# Altium PCB FMU3_REV_E.PcbDoc (part 1 of 4)
Units mm, origin at the board's own origin, x right, y up, seen from the top; angles counter-clockwise.
Board outline 34.01 x 34.03 mm, 8 copper layers (Top, GND_top, HorizontalTop, Verticall_top, Horizontal_bot, VerticalBot, GND_BOT, Bottom), stack 1.63 mm thick; 171 components, 250 nets, 878 pads, 427 vias.
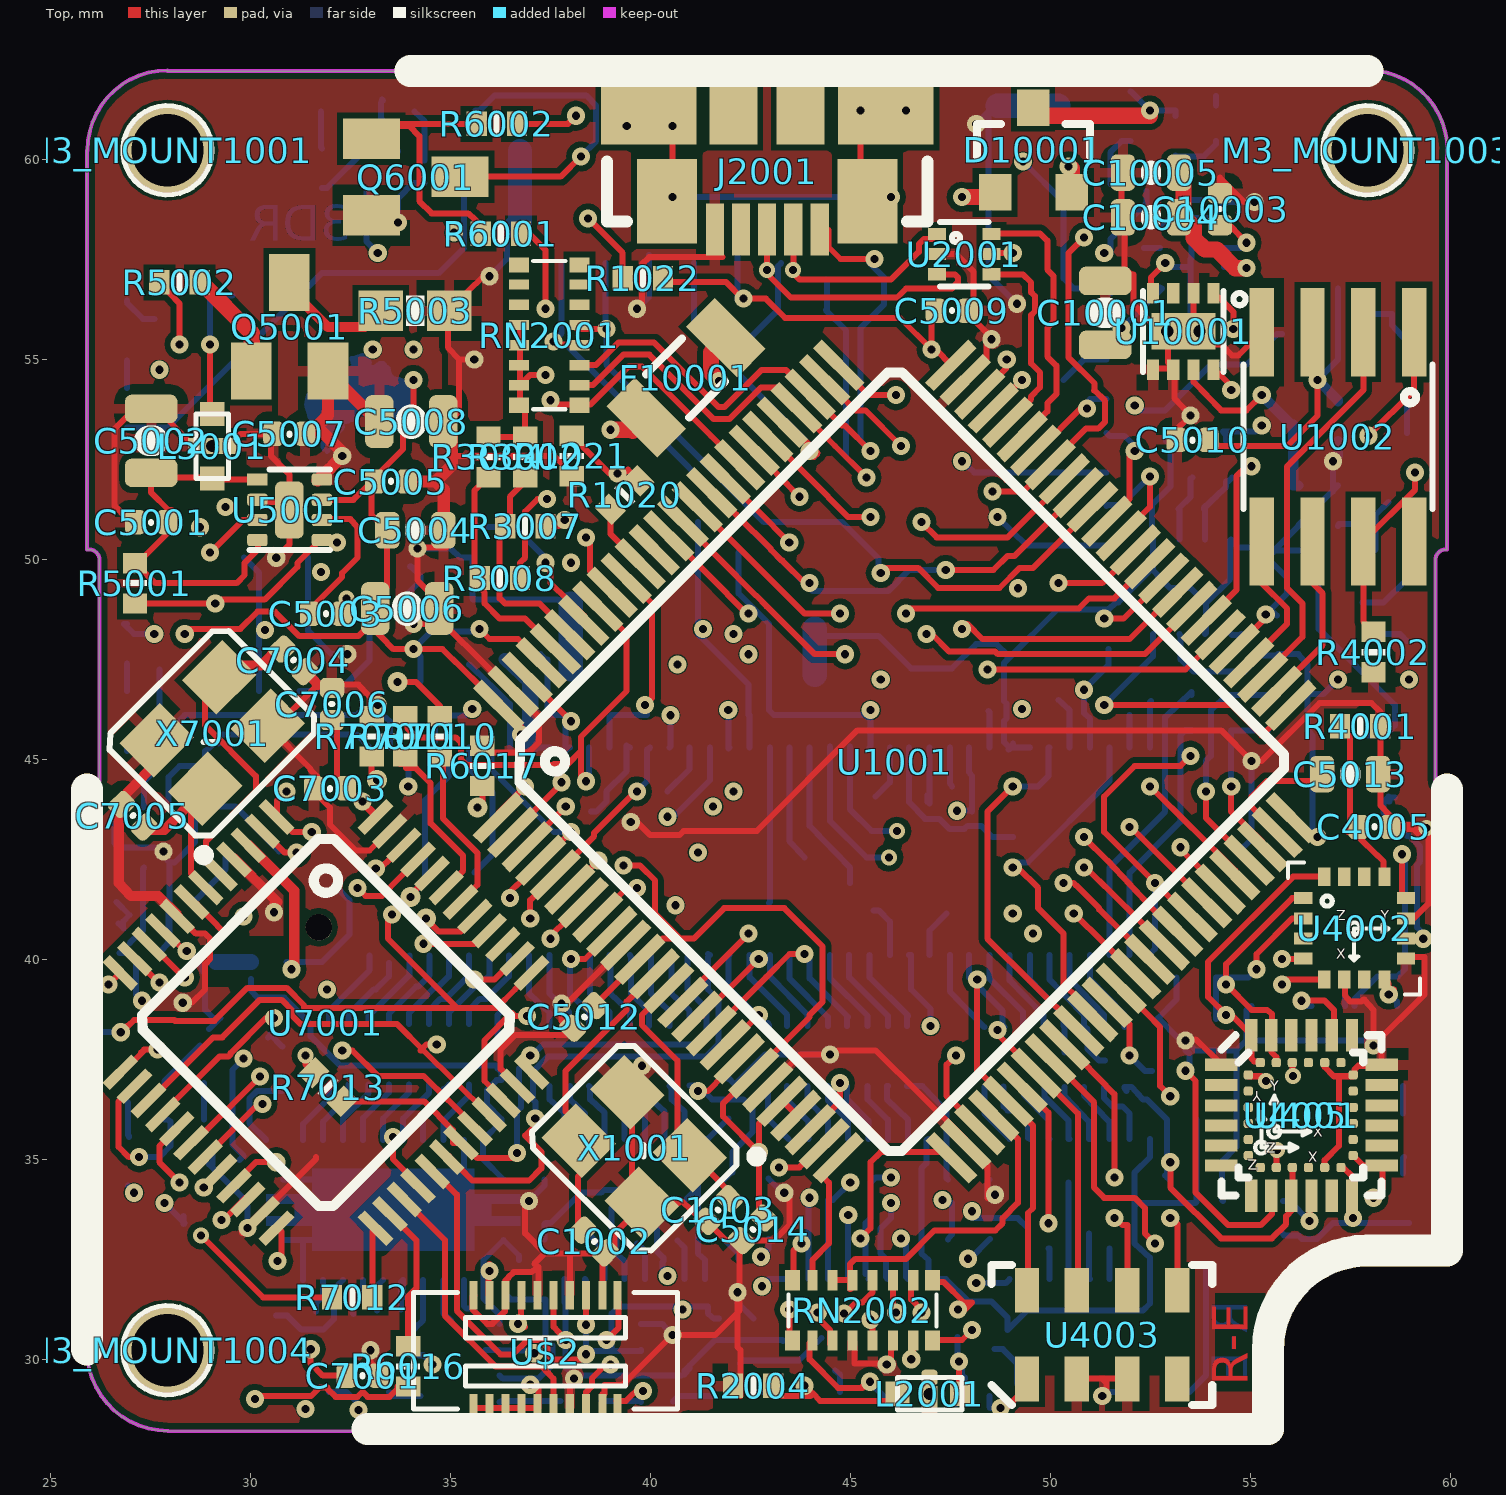
[diagram p0: Top view]
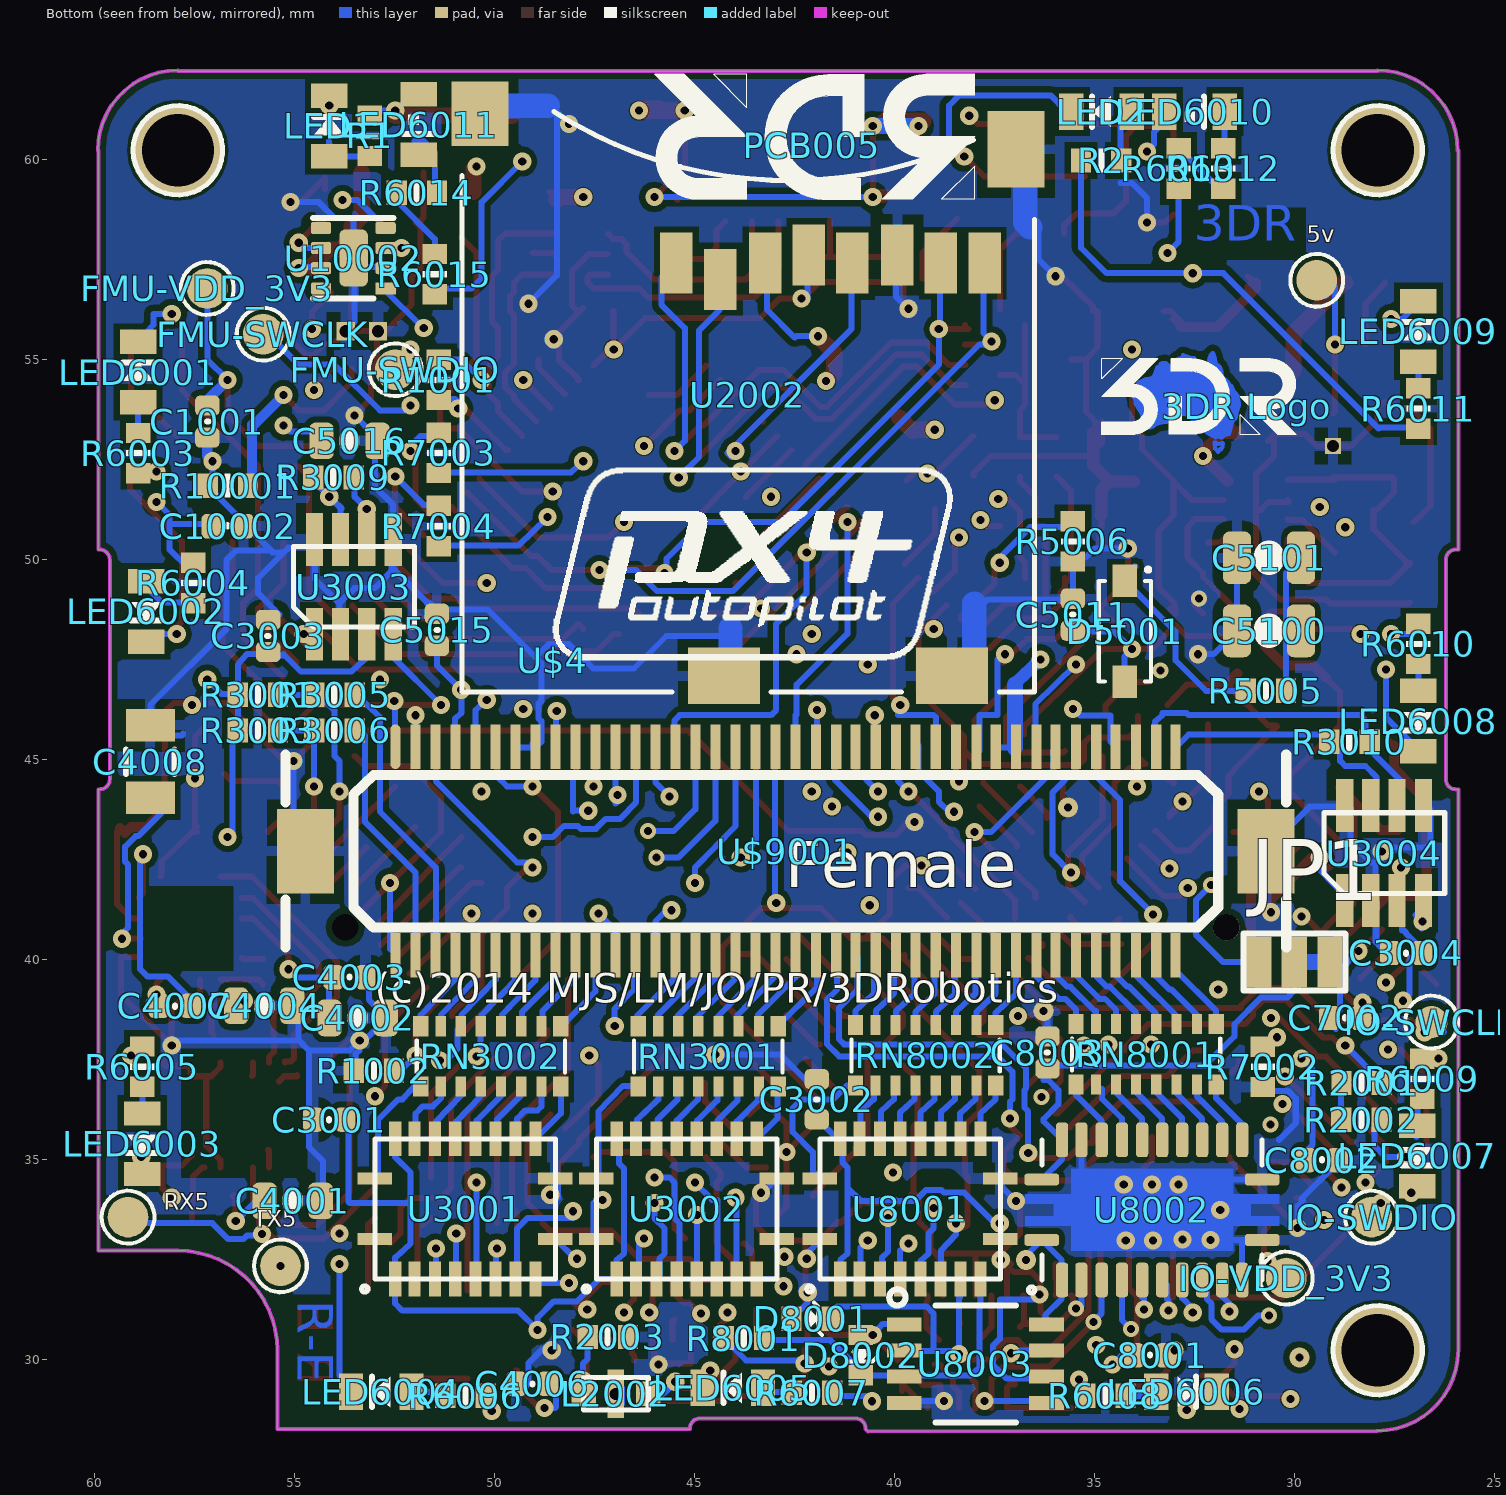
[diagram p1: Bottom view, seen from below]
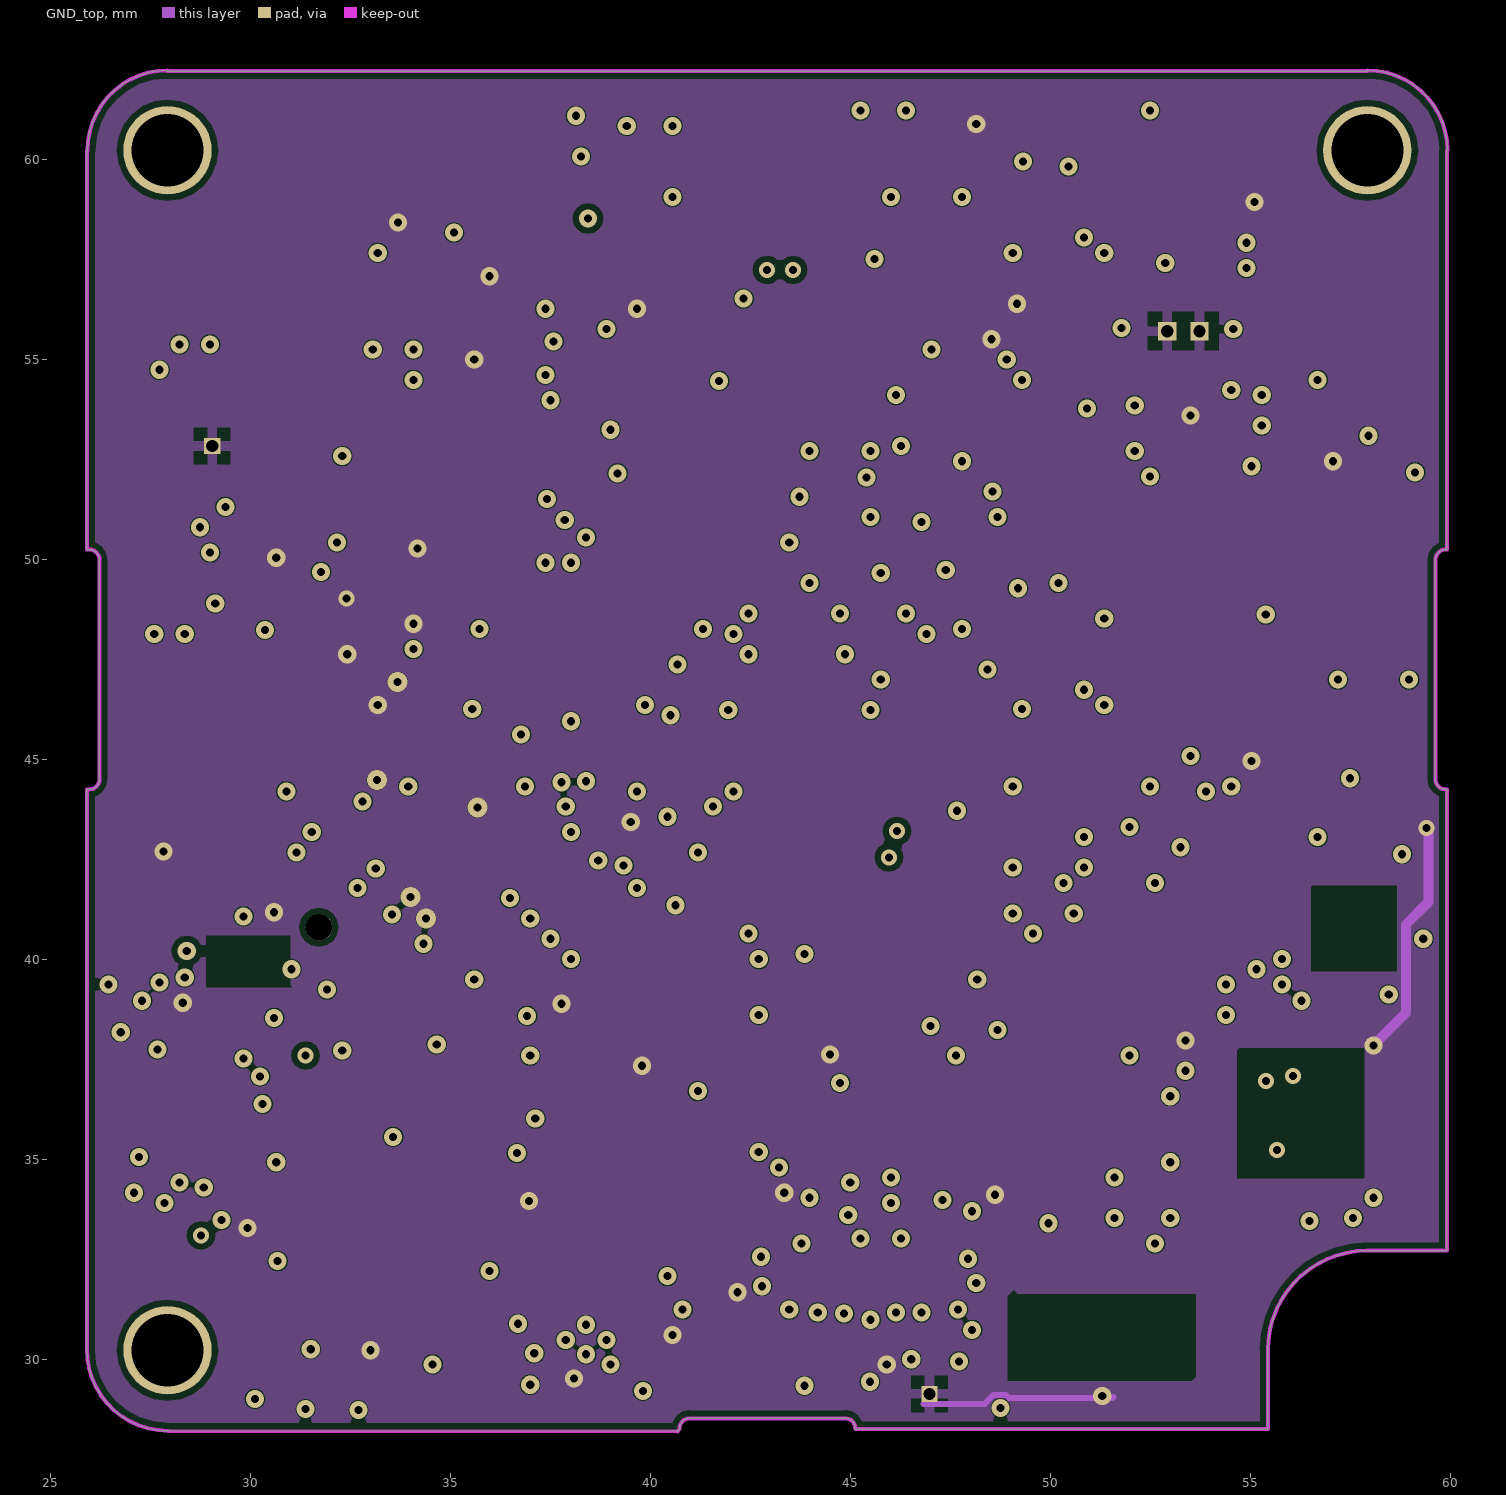
[diagram p2: GND_top]
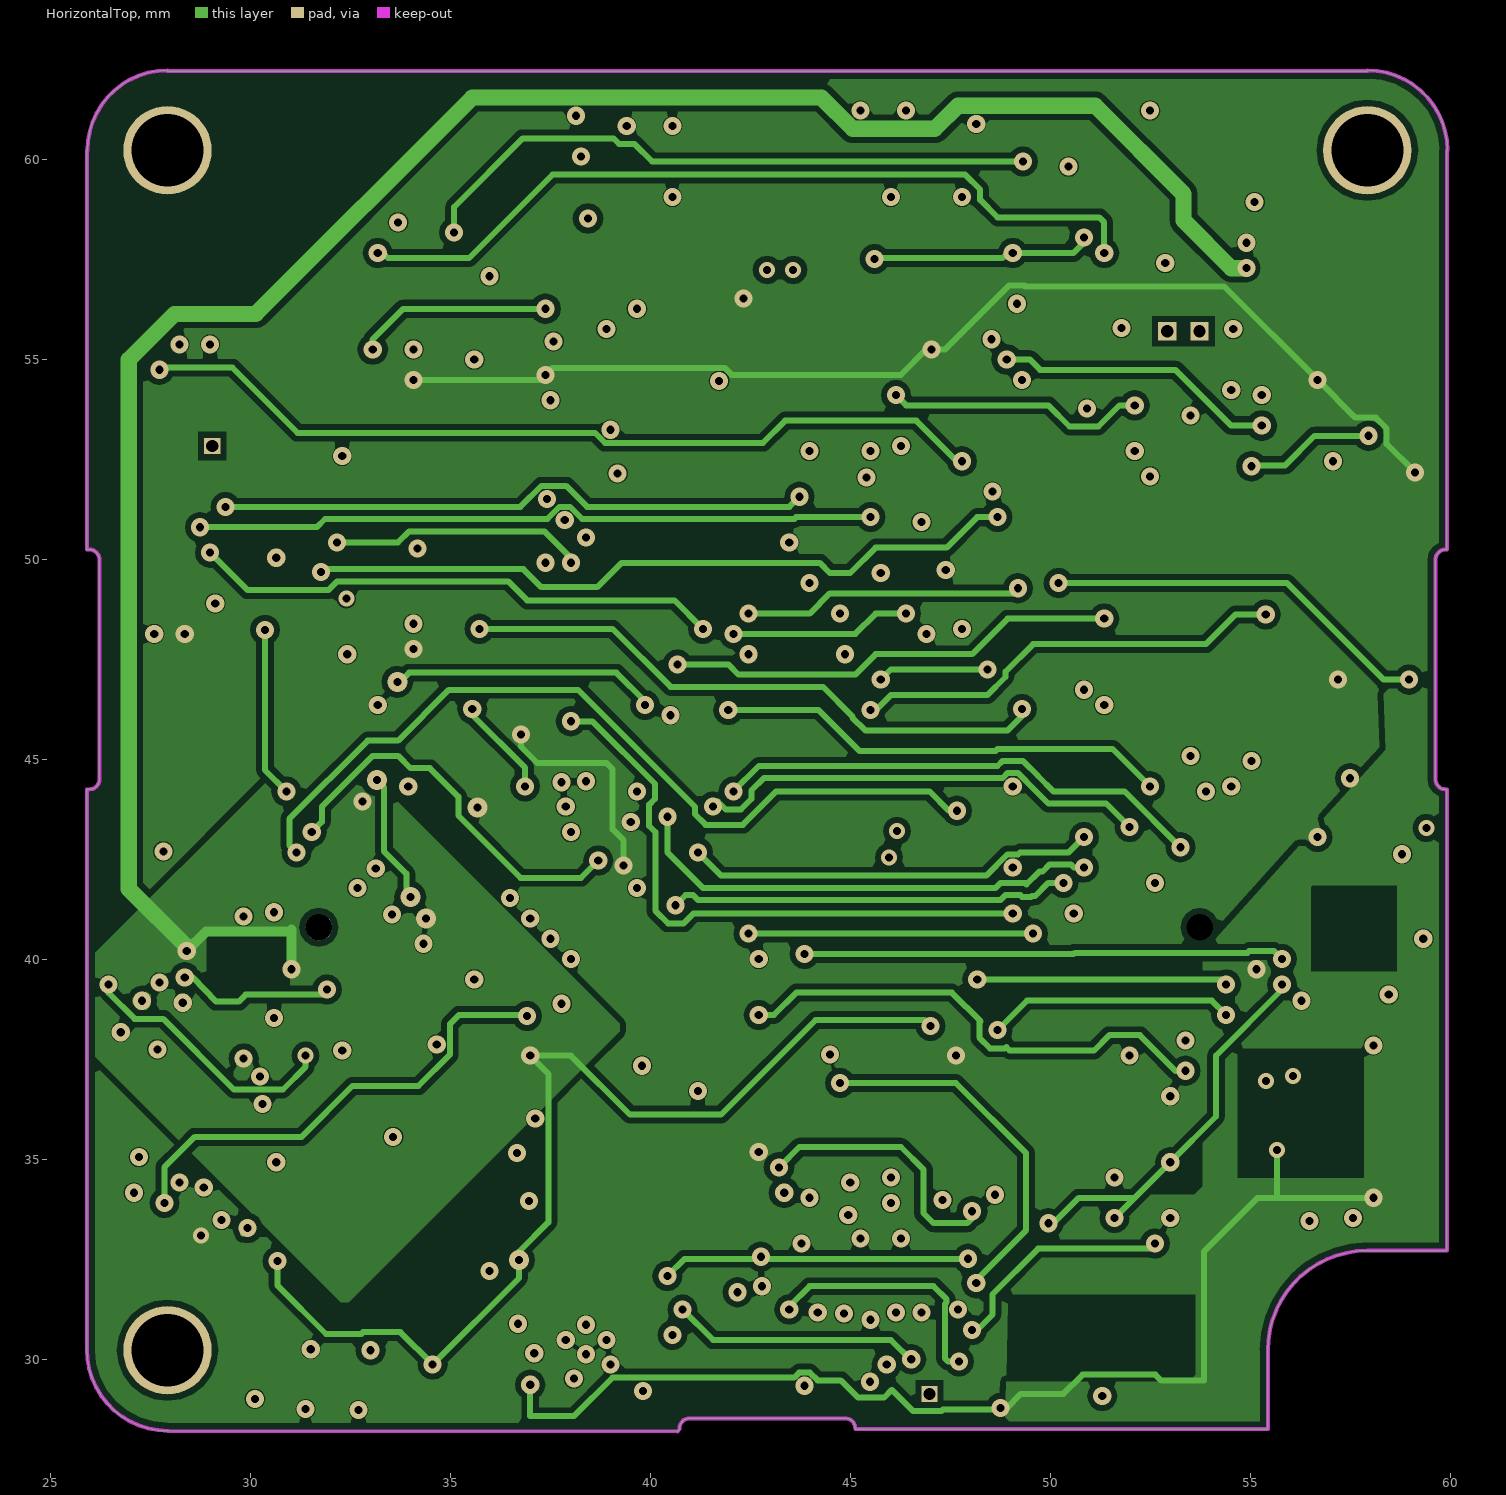
[diagram p3: HorizontalTop]
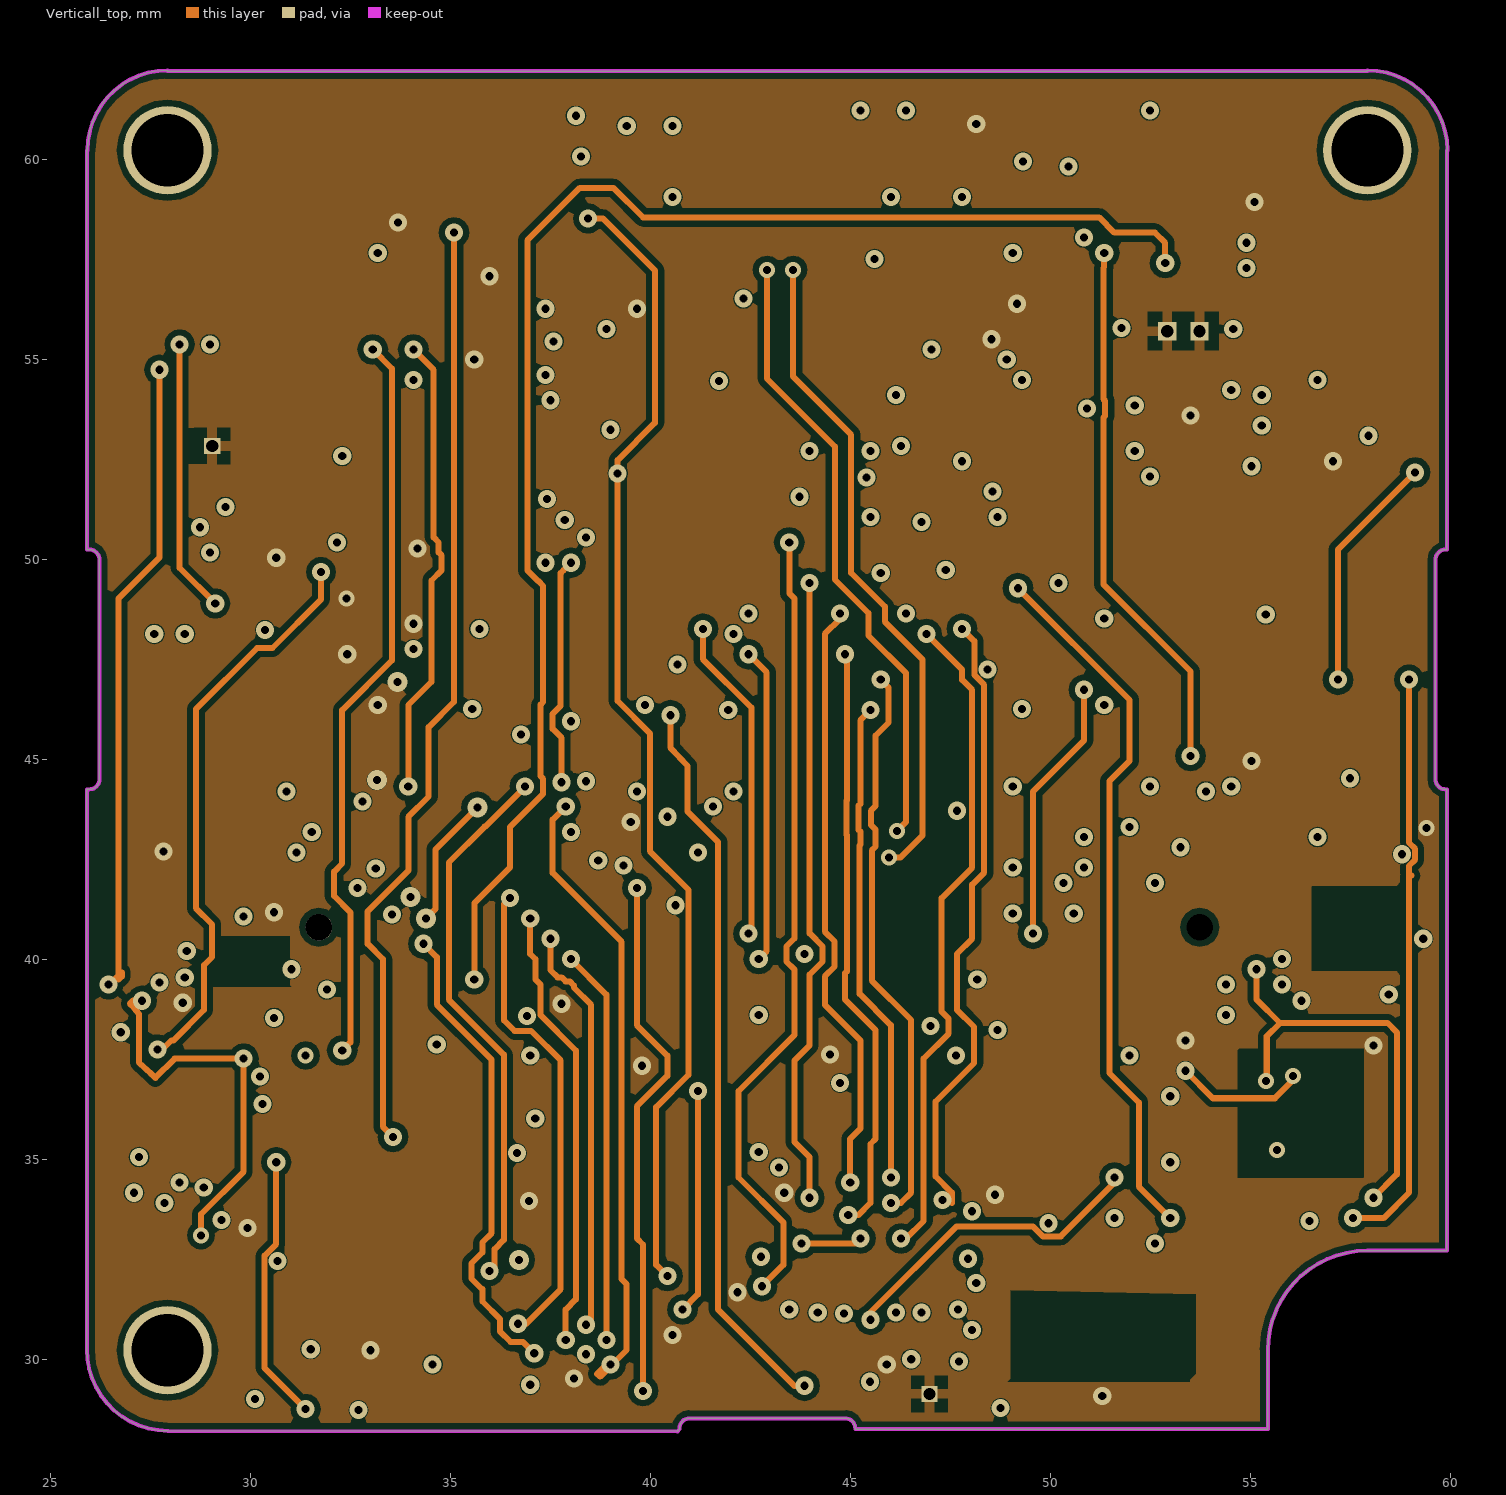
[diagram p4: Verticall_top]
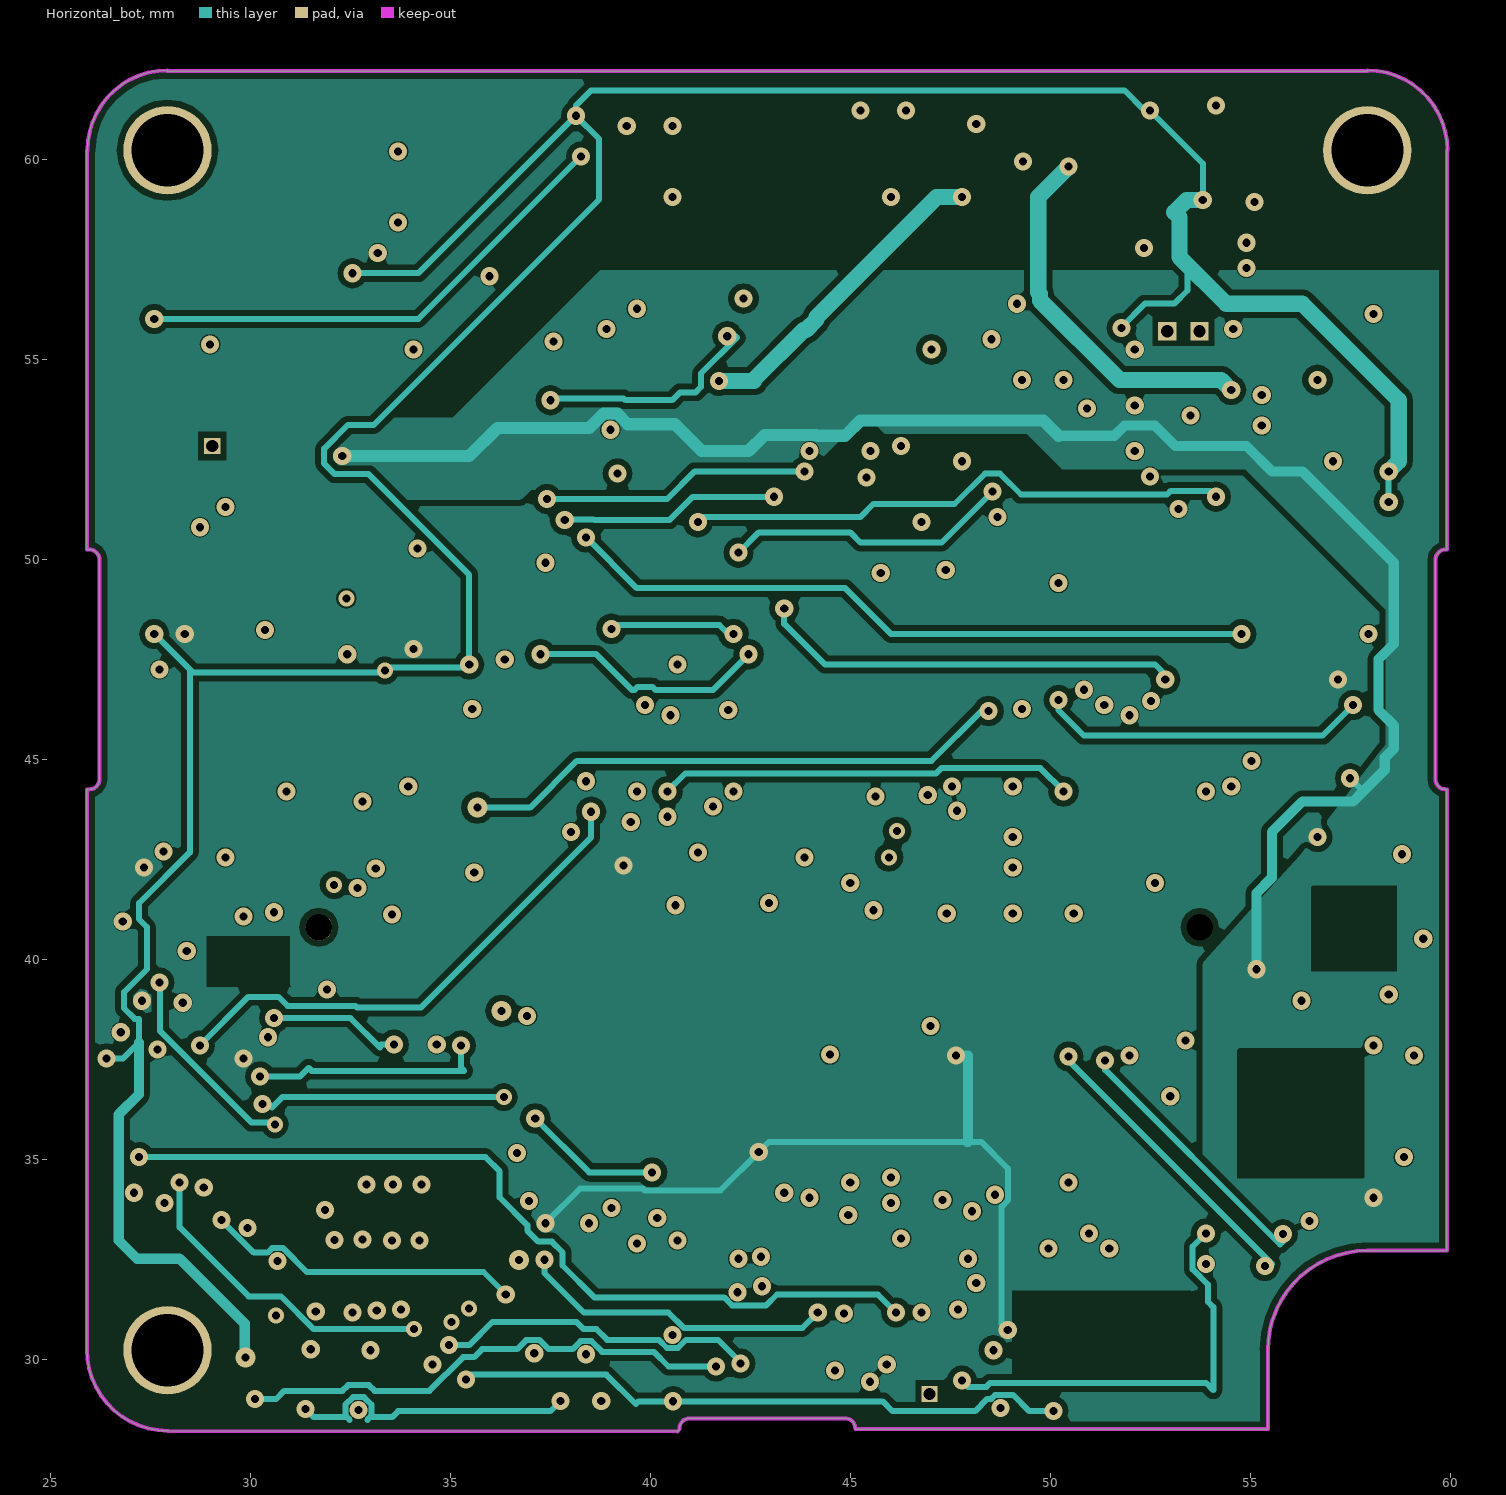
[diagram p5: Horizontal_bot]
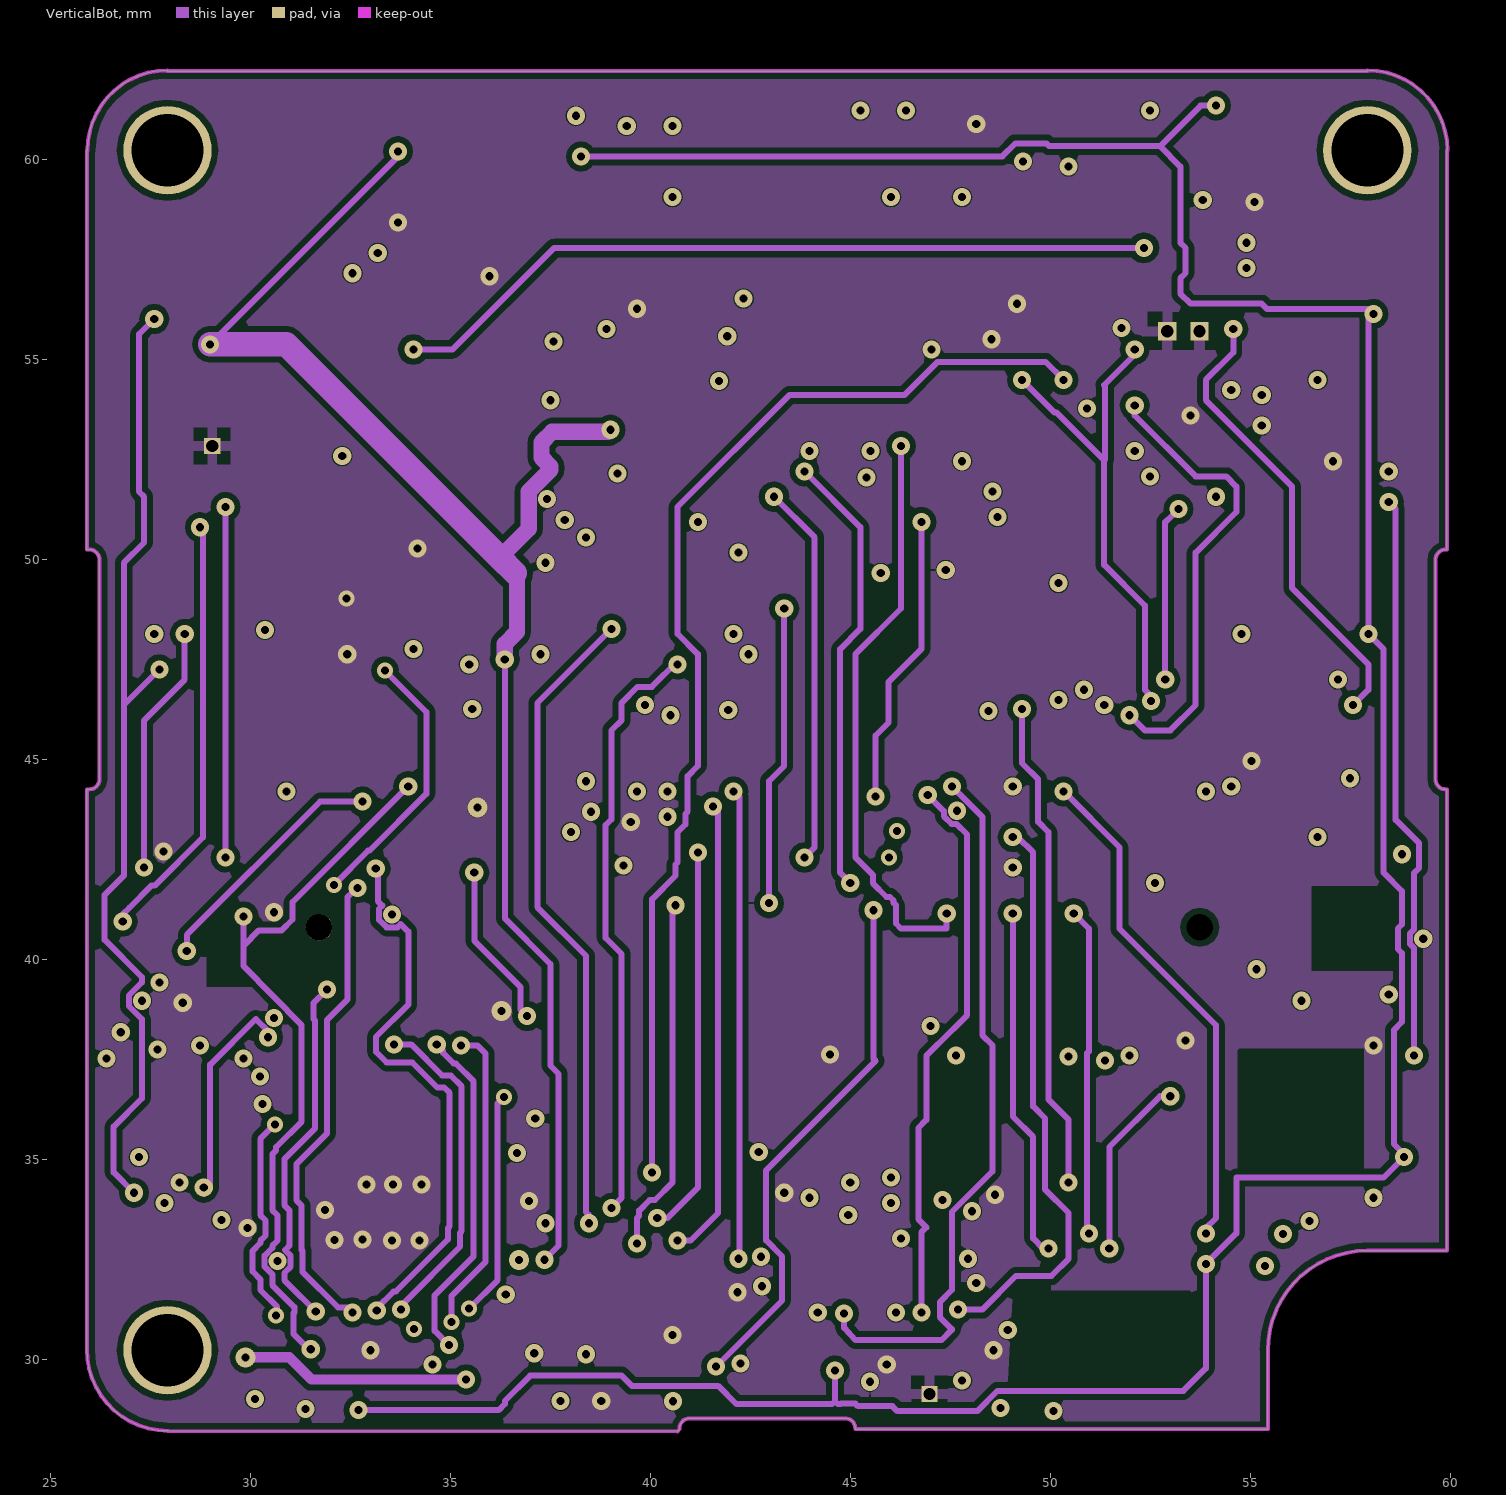
[diagram p6: VerticalBot]
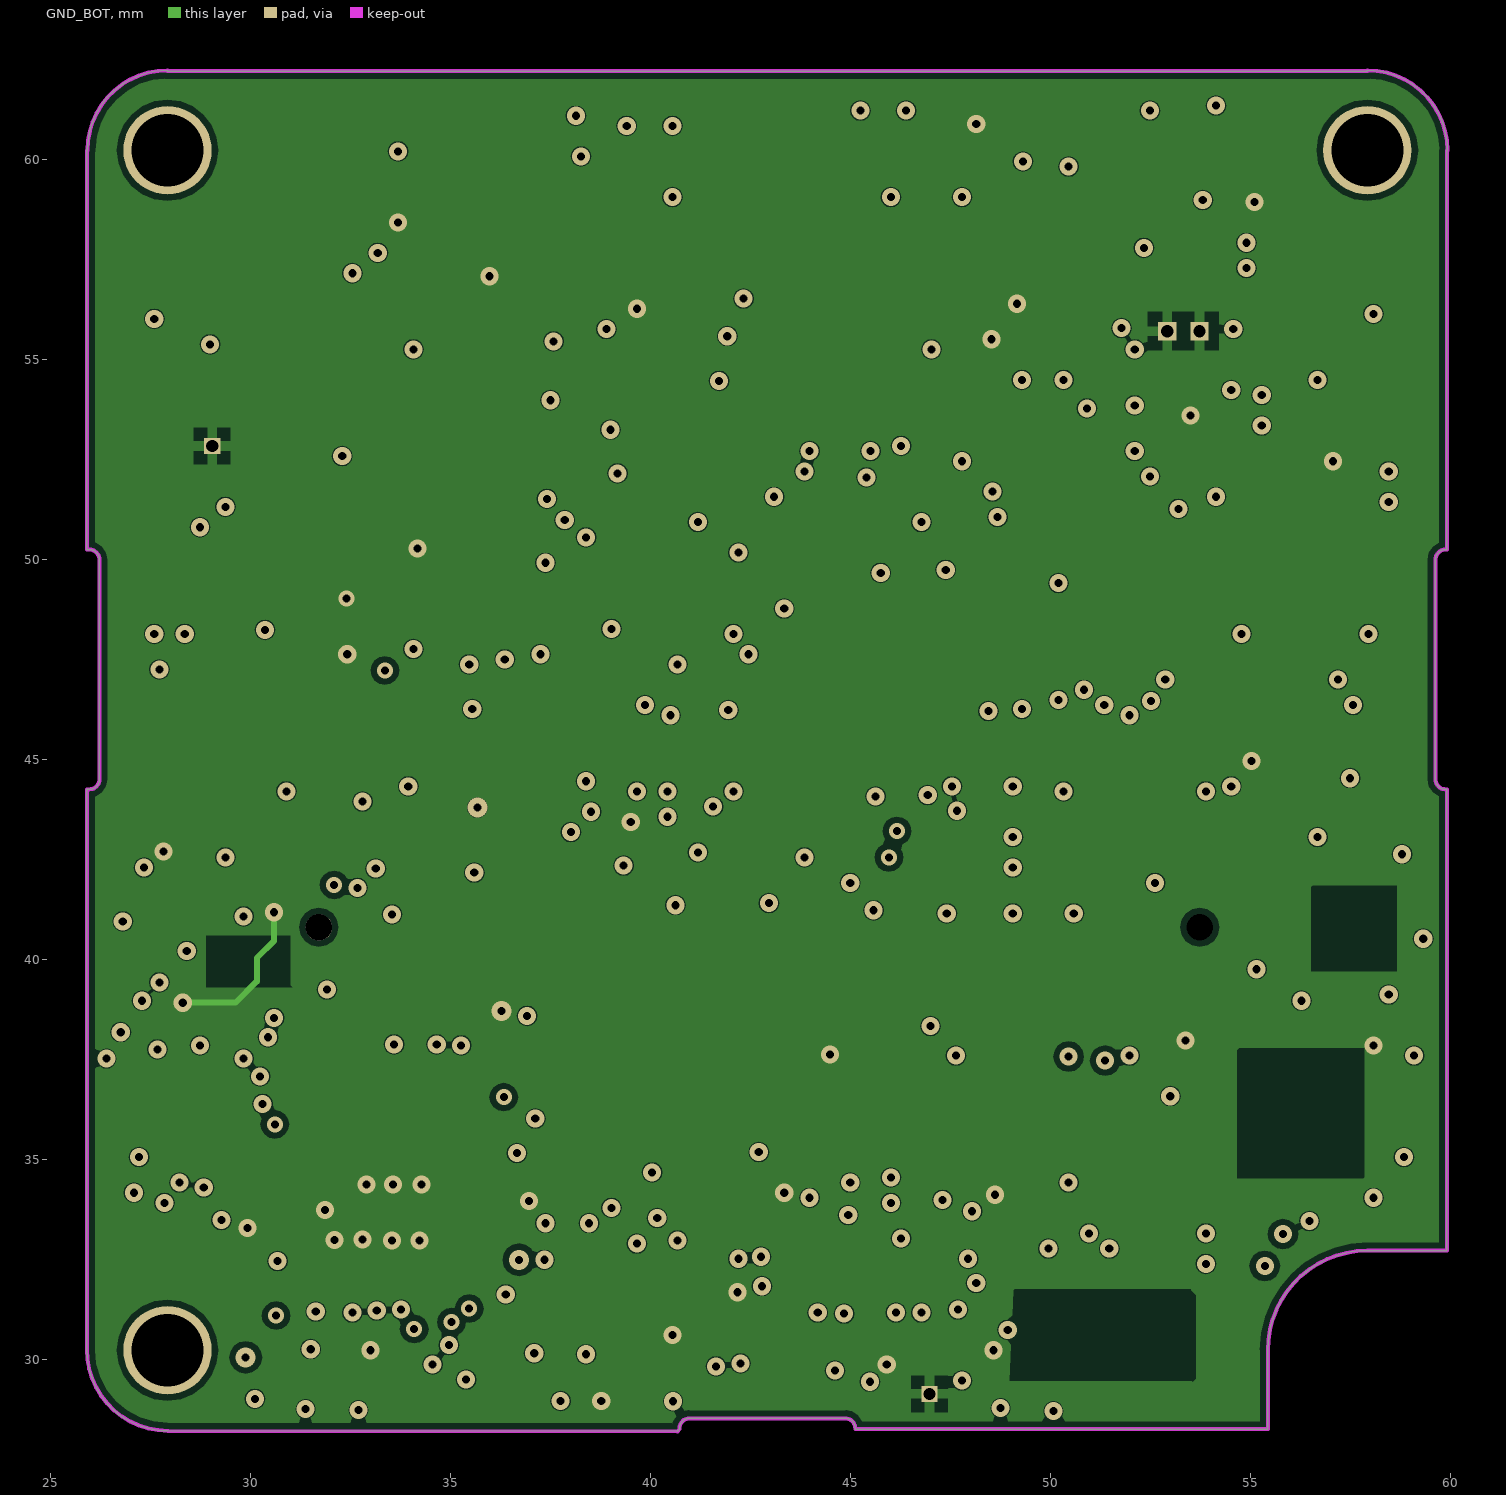
[diagram p7: GND_BOT]

## Layer stack, top to bottom
Top Solder: solder mask 0.0102, Solder Resist (Black Matte), Dk 3.5
Top: signal copper 0.035
Dielectric 1: core 0.15, FR-4, Dk 4.8
GND_top: signal copper 0.035
Dielectric 2: prepreg 0.25, FR-4, Dk 4.8
HorizontalTop: signal copper 0.035
Dielectric 3: core 0.15, FR-4, Dk 4.8
Verticall_top: signal copper 0.035
Dielectric 4: prepreg 0.25, FR-4, Dk 4.8
Horizontal_bot: signal copper 0.035
Dielectric 5: core 0.15, FR-4, Dk 4.8
VerticalBot: signal copper 0.035
Dielectric 6: prepreg 0.25, FR-4, Dk 4.8
GND_BOT: signal copper 0.035
Dielectric 7: core 0.15, FR-4, Dk 4.8
Bottom: signal copper 0.035
Bottom Solder: solder mask 0.0102, Solder Resist (Black Matte), Dk 3.5

## Board outline
27.927,28.211 cw(c27.927,30.238) 25.9,30.238 25.9,44.247 25.959,44.247 ccw(c25.959,44.501) 26.213,44.501 26.213,49.987 ccw(c25.959,49.987) 25.959,50.241 25.9,50.241 25.9,60.223 25.915,60.223 cw(c27.915,60.223) 27.915,62.223 27.915,62.2 57.912,62.2 57.912,62.223 cw(c57.912,60.223) 59.912,60.223 59.9,60.223 59.9,50.241 59.868,50.241 ccw(c59.868,49.987) 59.614,49.987 59.614,44.501 ccw(c59.868,44.501) 59.868,44.247 59.9,44.247 59.9,32.715 57.912,32.715 ccw(c57.912,30.226) 55.423,30.226 55.423,28.25 45.11,28.25 45.11,28.27 ccw(c44.856,28.27) 44.856,28.524 40.97,28.524 ccw(c40.97,28.27) 40.716,28.27 40.716,28.25 40.66,28.194

## Design rules (kind name [scope] priority, off if disabled: settings)
Clearance Clearance_1 [InComponent('U1001') vs InComponent('U$9001')] p1: gap=0
Clearance [All] p2: gap=0.15
Clearance mdViaVia [IsVia vs IsVia] p3: gap=0.15
Clearance mdPadVia [IsPad vs IsVia] p4: gap=0.15
Clearance mdPadPad [IsPad vs IsPad] p5: gap=0.15
Clearance mdWireVia [(InLayerClass('Signal Layers') AND IsTrack) vs IsVia] p6: gap=0.15
Clearance mdWirePad [(InLayerClass('Signal Layers') AND IsTrack) vs IsPad] p7: gap=0.15
Clearance mdWireWire [(InLayerClass('Signal Layers') AND IsTrack) vs (InLayerClass('Signal Layers') AND IsTrack)] p8: gap=0.15
ComponentClearance ComponentClearance_1 [All] p1 off: gap=0 collisioncheckmode=3 verticalgap=0 showdistances=FALSE
ComponentClearance [InComponent('U1001') vs InComponent('U$9001')] p2 off: gap=0 collisioncheckmode=3 verticalgap=0 showdistances=FALSE
DiffPairsRouting [All] p1: maxlimit=0.254 minlimit=0.254 mostfreqgap=0.254 toplayer_minwidth=0.15 toplayer_maxwidth=0.381 toplayer_prefwidth=0.15 midlayer1_minwidth=0.15 midlayer1_maxwidth=0.381 midlayer1_prefwidth=0.15 midlayer2_minwidth=0.15 midlayer2_maxwidth=0.381 midlayer2_prefwidth=0.15 midlayer3_minwidth=0.15 midlayer3_maxwidth=0.381 midlayer3_prefwidth=0.15 midlayer12_minwidth=0.15 midlayer12_maxwidth=0.381 midlayer12_prefwidth=0.15 midlayer13_minwidth=0.15 midlayer13_maxwidth=0.381 midlayer13_prefwidth=0.15 midlayer14_minwidth=0.15 midlayer14_maxwidth=0.381 midlayer14_prefwidth=0.15 bottomlayer_minwidth=0.15 bottomlayer_maxwidth=0.381 bottomlayer_prefwidth=0.15 maxuncoupledlength=12.7
HoleSize [All] p1: absolutevalues=TRUE maxlimit=2540 minlimit=0.2 maxpercent=80.000 minpercent=20.000
HoleToHoleClearance HoleToHoleClearance_1 [(InComponent('L2001') OR InComponent('L2002'))] p1: gap=0 allowstackedmicrovias=TRUE
HoleToHoleClearance [All] p2: gap=0.203 allowstackedmicrovias=TRUE
MinimumSolderMaskSliver [All] p1 off: minsoldermaskwidth=0.254
PasteMaskExpansion [All] p1: expansion=0.025
PolygonConnect ThermalVias [IsVia] p1: connectstyle=Direct reliefconductorwidth=0.254 reliefentries=4 polygonreliefangle="90 Angle" airgapwidth=0.254
PolygonConnect [All] p2: connectstyle=Relief reliefconductorwidth=0.254 reliefentries=4 polygonreliefangle="90 Angle" airgapwidth=0.254
RoutingVias [All] p1: holewidth=0.2 width=0.5 viastyle="Through Hole" minholewidth=0.2 minwidth=0.4 maxholewidth=0.711 maxwidth=1.27
ShortCircuit ShortCircuit_1 [InNet ('No Net')] p1: allowed=TRUE
ShortCircuit [(InNet('F\M\U\-\L\E\D\_\A\M\B\E\R\') OR InNet('FMU-CH3'))] p2: allowed=TRUE
ShortCircuit ShortCircuit_2 [All] p3: allowed=FALSE
SilkToBoardRegionClearance [All] p1 off:
SilkToSilkClearance [All] p1 off: silktosilkclearance=0.254
SilkToSolderMaskClearance [IsPad] p1 off: minsilkscreentomaskgap=0.254 clearancetoexposedcopper=TRUE
SolderMaskExpansion [All] p1: expansion=0.025
Width logo [InComponent('3DR Logo')] p1: maxlimit=4 minlimit=0.1 preferedwidth=0.254
Width [All] p2: maxlimit=4 minlimit=0.15 preferedwidth=0.254
20 further rules are at their usual default settings.

## Classes and differential pairs
component class CHANGE_FMU3_REV_D: "3DR Logo"
component class IO_PWR_FMU3_REV_C: C10001 C10002 C10003 C10004 C10005 D10001 F10001 R10001 U10001 U10002
component class 80PIN_FMU3_REV_E: 5v FMU-SWCLK FMU-SWDIO FMU-VDD_3V3 IO-SWCLK IO-SWDIO IO-VDD_3V3 RX5 TX5 U405 U$9001
component class PWM_PPM_FMU3_REV_E: C8001 C8002 C8003 D8001 D8002 JP1 R8001 RN8001 RN8002 U8001 U8002 U8003
component class IO_FMU3_REV_C: C7001 C7002 C7003 C7004 C7005 C7006 R7001 R7002 R7003 R7004 R7010 R7011 R7012 R7013 R? U7001 X7001
component class LEDs_FMU3_REV_C: LED1 LED2 LED6001 LED6002 LED6003 LED6004 LED6005 LED6006 LED6007 LED6008 LED6009 LED6010 LED6011 Q6001 R1 R2 R6001 R6002 R6003 R6004 R6005 R6006 R6007 R6008 R6009 R6010 R6011 R6012 R6013 R6014 R6015 R6016 R6017
component class FMU_Power_FMU3_REV_C: C5001 C5002 C5003 C5004 C5005 C5006 C5007 C5008 C5009 C5010 C5011 C5012 C5013 C5014 C5015 C5016 C5100 C5101 D5001 L5001 Q5001 R5001 R5002 R5003 R5005 R5006 U5001
component class SENSORS_FMU3_REV_C: C4001 C4002 C4003 C4004 C4005 C4006 C4007 C4008 R4001 R4002 U4001 U4002 U4003 U$2
component class SERIAL_FMU3_REV_C: C3001 C3002 C3003 C3004 R3001 R3002 R3003 R3004 R3005 R3006 R3007 R3008 R3009 R3010 RN3001 RN3002 U3001 U3002 U3003 U3004
component class SD_USB_FMU3_REV_C: J2001 L2001 L2002 R2001 R2002 R2003 R2004 RN2001 RN2002 U2001 U2002
component class FMU_FMU3_REV_C: C1001 C1002 C1003 M3_MOUNT1001 M3_MOUNT1003 M3_MOUNT1004 PCB005 R1001 R1002 R1020 R1021 R1022 U1001 U1002 U$4 X1001
differential pair OTG: +OTG_P -OTG_N
differential pair OTG_FS: +OTG_FS_P -OTG_FS_N

## Components (designator, comment, footprint, x,y, rotation, side; value= is the part's Value field where it differs from the comment)
"3DR Logo" "DO NOT PLACE" 3DR_AU 31.191,53.823 r180 bottom
5v "PAD.04" PAD.04X.04#1 29.439,56.972 r180 bottom
C1001 "0u1" 0402-CAP#1 57.175,53.442 r270 bottom
C1002 "8p" 0402-CAP#1 38.583,32.944 r315 top
C1003 "8p" 0402-CAP#1 41.681,33.731 r45 top
C3001 "0u1" 0402-CAP#1 54.127,35.992 r0 bottom
C3002 "0u1" 0402-CAP#2 41.935,36.5 r90 bottom
C3003 "0u1" 0402-CAP#1 55.651,48.082 r90 bottom
C3004 "0u1" 0402-CAP#1 27.203,40.157 r0 bottom
C4001 "2u2" 0603-CAP 55.042,33.96 r180 bottom
C4002 "2u2" 0603-CAP 53.416,38.532 r180 bottom
C4003 "0u1" 0402-CAP#1 53.619,39.548 r180 bottom
C4004 "0u01" 0603-CAP 55.753,38.837 r180 bottom
C4005 "0u1" 0402-CAP#1 58.09,43.307 r0 top
C4006 "0u1" 0402-CAP#1 49.047,29.388 r0 bottom
C4007 "0u22" 0402-CAP#1 57.988,38.837 r0 bottom
C4008 "4u7" 0805 58.598,44.933 r90 bottom
C5001 "0u1" 0402-CAP#1 27.508,50.927 r180 top
C5002 "10u/25V" 0805-CAP 27.508,52.959 r90 top
C5003 "10n" 0402-CAP#1 31.877,48.641 r180 top
C5004 "1u" 0603-CAP 34.112,50.724 r0 top
C5005 "0u1" 0402-CAP#1 33.503,51.943 r0 top
C5006 "22u/25V" 0805-CAP 33.909,48.768 r0 top
C5007 "0u1" 0402-CAP#1 30.963,53.137 r180 top
C5008 "22u/25V" 0805-CAP 34.011,53.442 r0 top
C5009 "0u1" 0402-CAP#1 47.523,56.21 r0 top
C5010 "0u1" 0402-CAP#1 53.543,52.984 r180 top
C5011 "0u1" 0402-CAP#1 35.535,48.616 r90 bottom
C5012 "0u1" 0402-CAP#1 38.329,38.557 r225 top
C5013 "2u2" 0603-CAP 57.48,44.628 r0 top
C5014 "0u1" 0402-CAP#1 42.545,33.249 r225 top
C5015 "0u1" 0402-CAP#1 51.435,48.235 r270 bottom
C5016 "2u2" 0603-CAP 53.619,52.959 r180 bottom
C5100 "GRM21BR60G107ME15L" C0805 30.632,48.209 r180 bottom
C5101 "GRM21BR60G107ME15L" C0805 30.632,50.038 r180 bottom
C7001 "0u1" 0402-CAP#1 32.791,29.591 r180 top
C7002 "0u1" 0402-CAP#1 28.727,38.532 r180 bottom
C7003 "0u1" 0402-CAP#1 31.979,44.272 r180 top
C7004 "8p" 0402-CAP#1 31.064,47.473 r315 top
C7005 "8p" 0402-CAP#1 27.051,43.586 r315 top
C7006 "0u1" 0402-CAP#1 32.029,46.38 r90 top
C8001 "0u1" 0402-CAP#1 33.604,30.099 r180 bottom
C8002 "0u1" 0402-CAP#1 29.312,34.976 r180 bottom
C8003 "0u1" 0402-CAP#1 36.17,37.668 r90 bottom
C10001 "10u/25V" 0805-CAP 51.359,56.159 r90 top
C10002 "0u1" 0402-CAP#1 56.667,50.825 r180 bottom
C10003 "10n" 0402-CAP#1 54.229,58.75 r90 top
C10004 "10u" 0603-CAP 52.502,58.547 r180 top
C10005 "1u" 0603-CAP 52.502,59.665 r180 top
D5001 "Schottky barrier diode" SOD323 34.239,48.209 r270 bottom
D8001 "DIODE-TVS" 0402-TVS 42.062,31.013 r0 bottom
D8002 "DIODE-TVS" 0402-TVS 40.843,30.099 r90 bottom
D10001 "PMEG2005CT" SOT23-3 49.555,60.173 r0 top
F10001 "0ZCA0035FF2G" PTC-1206 40.869,54.534 r45 top
FMU-SWCLK "PAD.04" PAD.04X.04#2 55.778,55.626 r0 bottom
FMU-SWDIO "PAD.04" PAD.04X.04#2 52.476,54.737 r180 bottom
FMU-VDD_3V3 "PAD.04" PAD.04X.04#2 57.175,56.769 r90 bottom
IO-SWCLK "PAD.04" PAD.04X.04#3 26.568,38.43 r180 bottom
IO-SWDIO "PAD.04" PAD.04X.04#2 28.067,33.553 r180 bottom
IO-VDD_3V3 "PAD.04" PAD.04X.04#2 30.201,32.029 r180 bottom
J2001 "47346-0001" MOLEX-47346-0001 42.901,61.265 r270 top
JP1 "J_1-2" SJ_3_NO_PLACE_1-2_short 29.997,39.929 r0 bottom
L2001 "Kyocera KNH16C104DA5TS EMI filter" KYOCERA-KNH16-DA#1 46.965,29.134 r0 top
L2002 "Kyocera KNH16C104DA5TS EMI filter" KYOCERA-KNH16-DA#2 46.965,29.134 r180 bottom
L5001 "Kyocera KNH16C104DA5TS EMI filter" KYOCERA-KNH16-DA#2 29.032,52.832 r270 top
LED1 "LED0603_Green" 0603-LED-Blue 54.127,60.833 r270 bottom
LED2 "LED0603_Green" 0603-LED-Blue 34.823,61.189 r180 bottom
LED6001 "LED0603_Green" 0603-LED-Blue 58.903,54.686 r270 bottom
LED6002 "LED0603_Green" 0603-LED-Blue 58.699,48.692 r90 bottom
LED6003 "LED0603_Green" 0603-LED-Blue 58.801,35.382 r90 bottom
LED6004 "LED0603_Green" 0603-LED-Blue 52.832,29.185 r180 bottom
LED6005 "LED0603_Green" 0603-LED-Blue 44.044,29.286 r180 bottom
LED6006 "LED0603_Green" 0603-LED-Blue 32.69,29.185 r0 bottom
LED6007 "LED0603_Green" 0603-LED-Blue 26.924,35.077 r90 bottom
LED6008 "LED0603_Green" 0603-LED-Blue 26.899,45.949 r90 bottom
LED6009 "LED0603_Green" 0603-LED-Blue 26.899,55.702 r270 bottom
LED6010 "AMBER" 0603-LED 32.487,61.189 r0 bottom
LED6011 "AMBER" 0603-LED 51.892,60.858 r90 bottom
M3_MOUNT1001 "MOUNT-HOLE1.8MM" MOUNT-HOLE1.8 27.915,60.223 r0 top
M3_MOUNT1003 "MOUNT-HOLE1.8MM" MOUNT-HOLE1.8 57.912,60.223 r0 top
M3_MOUNT1004 "MOUNT-HOLE1.8MM" MOUNT-HOLE1.8 27.915,30.226 r0 top
PCB005 "PCB005" 3DR_SMALLER 42.062,60.35 r0 bottom
Q5001 "MMBT3906*SMD" SOT23-BEC 30.963,55.804 r0 top
Q6001 "BSS123" SOT23 34.112,59.563 r270 top
R1 "220R" 0402-RES 53.111,60.579 r90 bottom
R2 "220R" 0402-RES 34.823,59.969 r0 bottom
R1001 "470R" 0402-RES 51.384,54.483 r90 bottom
R1002 "10K" 0402-RES 53.01,37.211 r0 bottom
R1020 "220R" 0402-RES 39.345,51.613 r225 top
R1021 "10K" 0402-RES 38.024,52.578 r90 top
R1022 "220R" 0402-RES 39.802,57.023 r180 top
R2001 "10K/0.1%" 0402-RES 28.321,36.906 r180 bottom
R2002 "10K/0.1%" 0402-RES 28.321,35.992 r0 bottom
R2003 "1M" 0402-RES 47.168,30.556 r180 bottom
R2004 "1M" 0402-RES 42.562,29.333 r180 top
R3001 "1K5" 0402-RES 55.905,46.609 r0 bottom
R3002 "1K5" 0402-RES 36.855,52.553 r90 top
R3003 "1K5" 0402-RES 55.905,45.72 r0 bottom
R3004 "1K5" 0402-RES 35.941,52.553 r90 top
R3005 "120R" 0402-RES 54,46.609 r180 bottom
R3006 "120R" 0402-RES 54,45.72 r180 bottom
R3007 "120R" 0402-RES 36.855,50.825 r0 top
R3008 "120R" 0402-RES 36.22,49.53 r0 top
R3009 "120R" 0402-RES 54.026,52.045 r180 bottom
R3010 "120R" 0402-RES 28.626,45.441 r180 bottom
R4001 "220R" 0402-RES 57.734,45.822 r180 top
R4002 "220R" 0402-RES 58.064,47.676 r90 top
R5001 "10K" 0402-RES 27.102,49.403 r270 top
R5002 "1K8" 0402-RES 28.219,56.921 r180 top
R5003 "10R" 0603-RES 34.112,56.21 r180 top
R5005 "1K" 0402-RES 30.709,46.711 r0 bottom
R5006 "10K" 0402-RES 35.535,50.444 r90 bottom
R6001 "1K" 0402-RES 36.246,58.141 r0 top
R6002 "10K" 0402-RES 36.144,60.884 r0 top
R6003 "220R" 0402-RES 58.903,52.654 r270 bottom
R6004 "220R" 0402-RES 57.531,49.403 r90 bottom
R6005 "220R" 0402-RES 58.801,37.313 r90 bottom
R6006 "220R" 0402-RES 50.724,29.083 r180 bottom
R6007 "220R" 0402-RES 42.062,29.159 r180 bottom
R6008 "220R" 0402-RES 34.722,29.083 r0 bottom
R6009 "220R" 0402-RES 26.797,37.008 r90 bottom
R6010 "220R" 0402-RES 26.899,47.879 r90 bottom
R6011 "220R" 0402-RES 26.899,53.772 r270 bottom
R6012 "220R" 0402-RES 31.775,59.766 r90 bottom
R6013 "220R" 0402-RES 32.893,59.766 r90 bottom
R6014 "220R" 0402-RES 51.941,59.159 r180 bottom
R6015 "220R" 0402-RES 51.486,57.125 r90 bottom
R6016 "68R" 0402-RES 33.934,29.82 r90 top
R6017 "1K5" 0402-RES 35.789,44.831 r90 top
R7001 "10K" 0402-RES 33.02,45.568 r90 top
R7002 "10K" 0402-RES 30.785,37.313 r270 bottom
R7003 "220R" 0402-RES 51.384,52.654 r90 bottom
R7004 "220R" 0402-RES 51.384,50.825 r90 bottom
R7010 "220R" 0402-RES 34.722,45.568 r90 top
R7011 "220R" 0402-RES 33.858,45.568 r90 top
R7012 "220R" 0402-RES 32.537,31.547 r180 top
R7013 "220R" 0402-RES 31.928,36.805 r315 top
R8001 "10K" 0402-RES 43.764,30.531 r180 bottom
R10001 "100K" 0402-RES 56.667,51.841 r180 bottom
RN2001 "100K" EXB2HV 37.465,55.601 r90 top
RN2002 "10K/0.1%" EXB2HV 45.288,31.217 r0 top
RN3001 "120R" EXB2HV 44.653,37.567 r180 bottom
RN3002 "120R" EXB2HV 50.089,37.567 r180 bottom
RN8001 "120R" EXB2HV 33.706,37.617 r180 bottom
RN8002 "120R" EXB2HV 39.218,37.592 r180 bottom
RX5 "PAD.04" PAD.04X.04#1 59.157,33.553 r90 bottom
TX5 "PAD.04" PAD.04X.04#1 55.347,32.334 r90 bottom
U405 "MPU-9250" MPU-9250 56.236,36.093 r0 top
U1001 "STM32F4X7VX 100 pin" TQFP100 46.101,44.933 r45 top
U1002 "FM25V01" SO08 57.175,53.061 r180 top
U2001 "NUF2042XV6" SOT563-6 47.828,57.633 r270 top
U2002 "2908-05WB-MG" MICROSD 43.51,54.686 r180 bottom
U3001 "TXS0108QFN20" QFN20-RGY 50.724,33.757 r90 bottom
U3002 "TXS0108QFN20" QFN20-RGY 45.187,33.757 r90 bottom
U3003 "3.3-V CAN TRANSCEIVER" SOT23-8 53.518,49.301 r180 bottom
U3004 "3.3-V CAN TRANSCEIVER" SOT23-8 27.762,42.647 r180 bottom
U4001 "MPU-6000" QFN-24 56.261,36.093 r0 top
U4002 "HMC5983" HMC5983-new 57.582,40.767 r0 top
U4003 "MS5611-01BA" MS5611-01BA 51.283,30.607 r90 top
U5001 "MIC5332" MLF-8-EPAD 30.963,51.232 r0 top
U7001 "ST STM32F101/103 48pin LQFP" TQFP48 31.877,38.43 r225 top
U8001 "TXS0108QFN20" QFN20-RGY 39.599,33.757 r90 bottom
U8002 "SN74LVC8T245" QFN24-RGY 33.553,33.731 r90 bottom
U8003 "Dual inverter tri-state, 3.3V/5V" TSSOP8_SOT505-2 37.973,29.896 r270 bottom
U10001 "BQ24313" QFN8-DSG 53.315,55.702 r180 top
U10002 "MIC5332" MLF-8-EPAD 53.518,57.531 r0 bottom
U$2 "DF40C-20-DS" DF-40C-20DS 37.363,30.226 r0 top
U$4 "PX4-LOGO-10MM" PX4-LOGO-10MM 48.539,47.473 r180 bottom
U$9001 "CON-DF17-80F" CON-DF17-80F 42.723,42.697 r180 bottom
X1001 "Crystal Oscillator in 3.2x2.5 SMD" OSCILLATOR-3.2X2.5 39.599,35.281 r135 top
X7001 "Crystal Oscillator in 3.2x2.5 SMD" OSCILLATOR-3.2X2.5 29.032,45.644 r45 top

## Footprints (in the part's own frame and the unit in brackets; to place one, negate y for a bottom-side part, rotate by r counter-clockwise, add the part's x,y. Pads: shape width x height; smd on the part's side, far side on the other; paste and mask are expansions set on the pad)
3DR_AU [mm]
  Top region: -2.175,1 -2.25,0.925 -2.25,0.825 -2.4,0.675 -2.625,0.675 -2.8,0.5 -2.8,0.175 -2.7,0.075 -2.7,-0.1 -2.525,-0.275 -2.525,-0.425 -2.575,-0.475 -2.525,-0.525 -2.4,-0.525 -2.325,-0.45 -2.225,-0.45 -2.15,-0.375 -2.025,-0.375 -1.85,-0.2 -1.475,-0.2 -1.35,-0.325 -1.325,-0.3 -1.225,-0.3 -1.1,-0.425 -1.1,-0.55 -1.075,-0.55 -0.925,-0.7 -0.85,-0.7 -0.8,-0.75 -0.525,-0.75 -0.4,-0.625 -0.4,-0.425 -0.25,-0.275 -0.25,-0.1 -0.175,-0.025 -0.175,0.175 -0.275,0.275 -0.275,0.35 -0.375,0.45 -0.375,0.5 -0.4,0.5 -0.5,0.6 -0.5,0.625 -0.65,0.775 -0.65,0.95 -0.725,1.025 -0.775,1.025 -0.775,1.15 -0.85,1.225 -0.85,1.3 -0.875,1.3 -0.925,1.25 -0.925,1 -1,0.925 -1,0.825 -1.025,0.8 -1.075,0.85 -1.2,0.85 -1.325,0.975 -1.325,0.975 -1.375,1.025 -1.35,1.05 -1.35,1.175 -1.4,1.225 -1.575,1.225 -1.625,1.175 -1.725,1.175 -1.725,1.15 -1.775,1.1 -1.775,1 -1.8,1 -1.825,0.975 -1.85,1 -1.95,1 -2.025,1.075 -2.125,1.075
  Top lines w0.1: -0.192,0.047 -0.194,0.015 -0.201,-0.016 -0.211,-0.047 -0.225,-0.086 -0.239,-0.125 -0.251,-0.165 -0.258,-0.206 cw(c-0.439,-0.2) -0.336,-0.349 ccw(c1.383,-1.062) -0.44,-0.686 ccw(c-0.385,-1.046) -0.638,-0.784 -0.659,-0.77 -0.676,-0.76 -0.689,-0.752 -0.7,-0.747 -0.711,-0.746 -0.723,-0.748 -0.737,-0.754 -0.754,-0.764 -0.777,-0.777 -0.836,-0.745 -0.892,-0.716 -0.944,-0.686 -0.982,-0.662 -1.018,-0.634 -1.052,-0.602 -1.084,-0.563 -1.114,-0.518 -1.103,-0.493 -1.098,-0.472 -1.098,-0.455 -1.106,-0.435 -1.121,-0.415 -1.143,-0.392 -1.154,-0.395 -1.162,-0.397 -1.167,-0.398 -1.172,-0.397 -1.175,-0.396 -1.178,-0.395 -1.18,-0.392 -1.18,-0.39 -1.181,-0.386 -1.18,-0.378 -1.178,-0.369 -1.175,-0.356 -1.172,-0.342 -1.174,-0.329 -1.177,-0.32 -1.18,-0.314 -1.182,-0.312 -1.185,-0.31 -1.188,-0.31 -1.191,-0.311 -1.195,-0.313 -1.199,-0.316 -1.206,-0.325 -1.214,-0.337 -1.222,-0.351 -1.23,-0.365 -1.236,-0.375 -1.241,-0.375 -1.244,-0.374 -1.247,-0.372 -1.25,-0.368 -1.251,-0.362 -1.25,-0.348 -1.247,-0.331 -1.242,-0.313 -1.234,-0.284 -1.231,-0.27 -1.23,-0.264 -1.231,-0.258 cw(c-1.322,-0.176) -1.294,-0.296 -1.311,-0.317 -1.323,-0.333 -1.331,-0.342 -1.333,-0.344 -1.336,-0.346 -1.338,-0.346 -1.34,-0.346 -1.342,-0.345 -1.344,-0.343 -1.35,-0.333 -1.359,-0.316 -1.37,-0.291 -1.388,-0.263 -1.412,-0.241 -1.442,-0.223 -1.476,-0.21 -1.513,-0.201 -1.553,-0.195 -1.602,-0.193 -1.65,-0.195 -1.697,-0.201 -1.739,-0.209 -1.775,-0.22 ccw(c-1.007,-2.013) -1.982,-0.323 -2.008,-0.388 ccw(c-1.816,-1.986) -2.216,-0.427 -2.256,-0.446 -2.292,-0.469 -2.326,-0.492 -2.352,-0.508 -2.379,-0.522 -2.407,-0.531 -2.439,-0.534 -2.475,-0.531 -2.509,-0.524 -2.536,-0.518 -2.558,-0.512 -2.567,-0.507 -2.573,-0.501 -2.576,-0.496 -2.576,-0.489 -2.575,-0.481 -2.571,-0.471 -2.564,-0.456 -2.553,-0.437 -2.54,-0.414 -2.527,-0.362 -2.553,-0.324 -2.579,-0.286 -2.594,-0.261 -2.606,-0.236 -2.615,-0.209 -2.618,-0.181 -2.773,0.066 -2.751,0.073 -2.773,0.122 -2.789,0.169 -2.8,0.213 -2.807,0.256 -2.812,0.311 -2.815,0.368 -2.818,0.428 -2.825,0.494 -2.795,0.499 -2.77,0.509 -2.75,0.524 -2.728,0.549 -2.706,0.578 -2.682,0.61 -2.658,0.613 -2.637,0.62 -2.617,0.63 -2.593,0.645 -2.568,0.661 -2.54,0.675 -2.518,0.681 -2.495,0.685 -2.471,0.686 -2.441,0.688 -2.412,0.692 -2.384,0.701 -2.356,0.717 -2.334,0.736 -2.316,0.759 -2.301,0.784 -2.289,0.811 -2.277,0.847 -2.267,0.884 -2.256,0.92 -2.244,0.955 -2.229,0.986 -2.217,0.975 -2.209,0.969 -2.206,0.968 -2.204,0.967 -2.201,0.968 -2.197,0.97 -2.193,0.973 -2.187,0.98 -2.177,0.989 -2.164,0.999 -2.162,1.021 -2.157,1.039 -2.149,1.053 -2.132,1.069 -2.11,1.078 -2.086,1.083 -2.059,1.083 -2.033,1.081 -2.008,1.077 -1.977,1.042 -1.947,1.014 -1.916,0.995 -1.891,0.986 -1.864,0.981 -1.834,0.982 -1.801,0.988 -1.762,0.999 -1.764,1.02 -1.769,1.041 -1.776,1.06 -1.78,1.078 -1.781,1.095 -1.776,1.11 -1.768,1.119 -1.756,1.127 -1.74,1.134 -1.743,1.147 -1.742,1.158 -1.737,1.168 -1.728,1.176 -1.712,1.186 -1.691,1.194 -1.668,1.201 -1.644,1.207 -1.618,1.211 -1.594,1.214 -1.572,1.216 -1.554,1.218 -1.542,1.219 -1.543,1.232 -1.546,1.242 -1.551,1.249 -1.56,1.256 -1.57,1.26 -1.58,1.263 -1.588,1.267 -1.591,1.27 -1.593,1.273 -1.594,1.278 -1.593,1.284 cw(c-1.915,0.11) -1.386,1.206 -1.362,1.211 -1.344,1.213 -1.337,1.213 -1.331,1.213 -1.327,1.211 -1.323,1.209 -1.321,1.206 -1.32,1.201 -1.321,1.187 -1.326,1.167 -1.334,1.142 -1.347,1.14 -1.358,1.136 -1.367,1.13 -1.371,1.124 -1.374,1.118 -1.374,1.111 -1.372,1.104 -1.369,1.099 -1.363,1.093 -1.354,1.088 -1.386,1.025 -1.353,1.001 -1.318,0.973 -1.28,0.943 -1.241,0.913 -1.207,0.888 -1.172,0.865 -1.137,0.846 -1.103,0.831 -1.069,0.821 -1.036,0.818 ccw(c-1.47,1.161) -0.971,0.921 -0.965,0.952 -0.96,0.988 -0.955,1.028 -0.95,1.071 -0.944,1.115 -0.937,1.157 -0.928,1.197 -0.917,1.235 -0.903,1.267 -0.887,1.296 -0.866,1.319 -0.842,1.336 cw(c-2.095,0.858) -0.764,1.025 -0.74,1.023 -0.719,1.016 -0.701,1.005 -0.685,0.991 -0.668,0.967 -0.654,0.939 -0.644,0.908 -0.634,0.868 -0.627,0.826 -0.621,0.786 -0.615,0.748 -0.608,0.714 -0.579,0.695 -0.548,0.677 -0.523,0.662 -0.499,0.644 -0.479,0.623 -0.462,0.599 -0.45,0.577 -0.441,0.557 -0.433,0.544 -0.424,0.532 -0.412,0.522 -0.396,0.513 -0.375,0.506 -0.364,0.466 -0.348,0.43 -0.328,0.396 -0.299,0.355 -0.266,0.315 -0.233,0.273 -0.226,0.228 -0.217,0.187 -0.209,0.152 -0.201,0.117 -0.194,0.079 -0.192,0.047 ; -0.594,-0.934 -0.599,-0.921 -0.703,-0.942 -0.785,-0.904 -0.804,-0.899 -0.804,-0.956 -0.787,-0.997 -0.795,-1.004 -0.786,-1.051 -0.73,-1.135 -0.712,-1.139 -0.664,-1.065 -0.642,-1.082 -0.599,-1.008 -0.594,-0.934
  silkscreen extent -3.62,-0.71 1.24,1.19
3DR_SMALLER [mm]
  silkscreen extent -4.07,-1.77 3.93,1.36
0402-CAP#1 [mil]
  rrect50% 20x24 smd mask+0: P$1(-15.75,0) P$2(15.75,0)
  silkscreen extent 0,0 0,1, body extent -20,-10 20,10, height 20
0402-CAP#2 [mil]
  rrect50% 20x24 smd mask+0: P$1(-19.68,0) P$2(19.69,0)
  silkscreen extent 0,0 0,1, body extent -20,-10 20,10, height 20
0402-RES [mil] "0402-RES"
  rect 20x24 smd: P$1(-19.68,0) P$2(20,0)
  silkscreen extent -3,-12 3,12, body extent -20,-10 20,10, height 20
0402-TVS [mil] "0402-TVS"
  rect 20x24 smd: A(20,0) C(-19.68,0)
  silkscreen extent -10,-16 3,16, body extent -20,-10 20,10, height 20
0603-CAP [mil] "0603-CAP"
  rrect50% 24x36 smd mask+0: P$1(-27.56,0) P$2(27.56,0)
  silkscreen extent 0,-2 0,2, body extent -31,-16 31,16, height 34
0603-LED [mil]
  rect 24x36 smd: A(30,0) C(-29.53,0)
  silkscreen extent -9,-15 10,15
0603-LED-Blue [mil] "0603-LED_Blue"
  rect 24x36 smd: A(30,0) C(-29.53,0)
  silkscreen extent -9,-15 9,15, body extent -33,-18 33,18, height 35
0603-RES [mil] "0603-RES"
  rect 44x40 smd: 1(-33.46,0) 2(34,0)
  silkscreen extent -9,-15 9,15, body extent -31,-16 31,16, height 34
0805 [mil] "0805"
  rect 32x48 smd: 1(-35.43,0) 2(36,0)
  silkscreen extent -12,-24 12,24, body extent -39,-25 39,25, height 31
0805-CAP [mil]
  rrect50% 28x52 smd mask+0: P$1(-31.5,0) P$2(31.5,0)
  silkscreen extent 0,-2 0,2, body extent -39,-25 39,25, height 31
C0805 [mil]
  rrect50% 28x52 smd mask+0: 1(-31.5,0) 2(31.5,0)
  silkscreen extent 0,-2 0,2, body extent -39,-25 39,25, height 31
CON-DF17-80F [mil]
  rrect100% 10x44 smd: 1(-383.86,103)
  rect 10x44 smd: 2(-383.86,-102.36) 3(-364.17,103) 4(-364.17,-102.36) 5(-344.49,103) 6(-344.49,-102.36) 7(-324.8,103) 8(-324.8,-102.36) 9(-305.12,103) 10(-305.12,-102.36) 11(-285.43,103) 12(-285.43,-102.36) 13(-265.75,103) 14(-265.75,-102.36) 15(-246.06,103) 16(-246.06,-102.36) 17(-226.38,103) 18(-226.38,-102.36) 19(-206.69,103) 20(-206.69,-102.36) 21(-187.01,103) 22(-187.01,-102.36) 23(-167.32,103) 24(-167.32,-102.36) 25(-147.64,103) 26(-147.64,-102.36) 27(-127.95,103) 28(-127.95,-102.36) 29(-108.27,103) 30(-108.27,-102.36) 31(-88.58,103) 32(-88.58,-102.36) 33(-68.9,103) 34(-68.9,-102.36) 35(-49.21,103) 36(-49.21,-102.36) 37(-29.53,103) 38(-29.53,-102.36) 39(-9.84,103) 40(-9.84,-102.36) 41(10,103) 42(10,-102.36) 43(30,103) 44(30,-102.36) 45(50,103) 46(50,-102.36) 47(69,103) 48(69,-102.36) 49(89,103) 50(89,-102.36) 51(109,103) 52(109,-102.36) 53(128,103) 54(128,-102.36) 55(148,103) 56(148,-102.36) 57(168,103) 58(168,-102.36) 59(188,103) 60(188,-102.36) 61(207,103) 62(207,-102.36) 63(227,103) 64(227,-102.36) 65(247,103) 66(247,-102.36) 67(266,103) 68(266,-102.36) 69(286,103) 70(286,-102.36) 71(306,103) 72(306,-102.36) 73(325,103) 74(325,-102.36) 75(345,103) 76(345,-102.36) 77(365,103) 78(365,-102.36) 79(384,103) 80(384,-102.36)
  rect 56x83 smd: GND(-472.44,0) GND(473,0)
  round 25.98 hole 26 unplated: hole-2(434,-74.8)
  silkscreen extent -492,-94 493,95, body extent -492,-112 492,112, height 118
DF-40C-20DS [mil] "DF-40C-20DS"
  rect 8x28 smd: 1(71,-57.09) 2(71,54) 3(56,-57.09) 4(56,54) 5(40,-57.09) 6(40,54) 7(24,-57.09) 8(24,54) 9(8,-57.09) 10(8,54) 11(-7.87,-57.09) 12(-7.87,54) 13(-23.62,-57.09) 14(-23.62,54) 15(-39.37,-57.09) 16(-39.37,54) 17(-55.12,-57.09) 18(-55.12,54) 19(-70.87,-57.09) 20(-70.87,54)
  silkscreen extent -130,-75 130,57, body extent -130,-68 130,65, height 55
EXB2HV [mil] "EXB2HV"
  rect 15x20 smd: 1(-68.9,-29.53) 8(69,-29.53) 9(69,30) 16(-68.9,30)
  rect 10x20 smd: 2(-49.21,-29.53) 3(-29.53,-29.53) 4(-9.84,-29.53) 5(10,-29.53) 6(30,-29.53) 7(50,-29.53) 10(50,30) 11(30,30) 12(10,30) 13(-9.84,30) 14(-29.53,30) 15(-49.21,30)
  silkscreen extent -73,-16 73,16, body extent -80,-20 80,20, height 20
HMC5983-new [mil] "HMC5983"
  rect 18x12 smd: 1(-50.2,30) 2(-50.2,10) 3(-50.2,-9.84) 4(-50.2,-29.53) 9(51,-29.53) 10(51,-9.84) 11(51,10) 12(51,30)
  rect 12x18 smd: 5(-29.53,-50.2) 6(-9.84,-50.2) 7(10,-50.2) 8(30,-50.2) 13(30,51) 14(10,51) 15(-9.84,51) 16(-29.53,51)
  silkscreen extent -65,-65 65,65, body extent -59,-59 61,61, height 35
KYOCERA-KNH16-DA#1 [mil] "KYOCERA-KNH16-DA"
  rect 16x16 smd: GND(0,-15.75)
  rect 16x16 hole 12: GND(0,0)
  rrect50% 16x16 smd: GND(0,16)
  rect 24x24 smd: P$1(-31.5,0) P$2(32,0)
  silkscreen extent -31,-16 32,16, body extent -20,-10 20,10, height 14
KYOCERA-KNH16-DA#2 [mil] "KYOCERA-KNH16-DA"
  rect 16x16 smd: GND(0,-15.75) GND(0,16)
  rect 16x16 hole 12: GND(0,0)
  rect 24x24 smd: P$1(-31.5,0) P$2(32,0)
  silkscreen extent -31,-16 32,16, body extent -20,-10 20,10, height 14
MICROSD [mil] "MICROSD"
  rect 32x60 smd: 1(-76.38,107) 2(-33.07,91) 3(11,107) 4(54,115) 5(97,107) 6(141,115) 7(184,107) 8(227,107)
  rect 56x63.19 smd: 6(-269.68,254.05)
  rect 71x56 smd: 6(-29.53,-299.21) 6(195,-299.21)
  rect 56x75 smd: 6(258,219)
  silkscreen extent -287,-315 276,256, body extent -276,-315 276,285, height 73
MLF-8-EPAD [mil] "MLF-8-EPAD"
  rect 20x12 smd: 1(-31.5,30)
  rrect40% 20x12 smd: 2(-31.5,10) 3(-31.5,-9.84) 4(-31.5,-29.53) 5(32,-29.53) 6(32,-9.84) 7(32,10) 8(32,30)
  rrect40% 28x56 smd: GND(0,0)
  silkscreen extent -39,-39 40,40, body extent -40,-39 40,39, height 33
MOLEX-47346-0001 [mil]
  rect 51.26x18 smd: D+(118.89,0) D-(118.89,26) GND(118.89,-51.18) ID(118.89,-25.59) VBUS(118.89,52)
  rect 62.99x94 smd: GND1(3.93,117)
  rect 83x59 smd: GND2(91,99) GND3(91,-98.43)
  rect 63.19x94 smd: GND4(3.93,-116.14)
  rect 63.19x47 smd: GND5(3.93,-32.97) GND6(3.93,33)
  silkscreen extent 52,-157 111,158, body extent -94,-157 120,157, height 107
MOUNT-HOLE1.8 [mil]
  round 87 hole 71: 1(0,0)
  silkscreen extent -44,-44 44,44
MPU-9250 [mil] "MPU-9250 (hidden pads)  NO BOM"
  rrect50% 9.02x9 smd paste-39.37 mask-39.37: 1(-51.18,40) 2(-51.18,24) 3(-51.18,8) 4(-51.18,-7.87) 5(-51.18,-23.62) 6(-51.18,-39.37) 13(52.05,-39.37) 14(52.05,-23.62) 15(52.05,-7.87) 16(52.05,8) 17(52.05,24) 18(52.05,40)
  rrect50% 9x9.02 smd paste-39.37 mask-39.37: 7(-39.37,-51.18) 8(-23.62,-51.18) 9(-7.87,-51.18) 10(8,-51.18) 11(24,-51.18) 12(40,-51.18) 19(40,52.05) 20(24,52.05) 21(8,52.05) 22(-7.87,52.05) 23(-23.62,52.05) 24(-39.37,52.05)
  silkscreen extent -61,-61 62,62
MS5611-01BA [mil] "MS5611-01BA"
  rect 44x24 smd: 1(-43.31,74) 2(-43.31,25) 3(-43.31,-24.61) 4(-43.31,-73.82) 5(44,-73.82) 6(44,-24.61) 7(44,25) 8(44,74)
  silkscreen extent -69,-108 69,109, body extent -59,-98 59,99, height 39
OSCILLATOR-3.2X2.5 [mil] "OSCILLATOR-3.2X2.5"
  rect 56x48 smd: 1(-43.31,-33.46) 2(44,-33.46) 3(44,34) 4(-43.31,34)
  silkscreen extent -95,-83 83,71
PAD.04X.04#1 [mil]
  rrect100% 40x40 smd paste-78.74: P$1(0,0)
  silkscreen extent -26,-26 26,26
PAD.04X.04#2 [mil]
  rrect100% 40x40 smd: P$1(0,0)
  silkscreen extent -26,-26 26,26
PAD.04X.04#3 [mil]
  rrect100% 31.5x31.5 smd: P$1(0,0)
  silkscreen extent -26,-26 26,26
PTC-1206 [mil] "PTC-1206"
  rect 40x71 smd: 1(-55.12,0) 2(56,0)
  silkscreen extent -25,-30 25,30, body extent -60,-30 65,30, height 20
PX4-LOGO-10MM [mm]
  silkscreen extent -0.01,-0.01 10.01,4.83
QFN8-DSG [mil] "QFN8-DSG"
  rect 12x20 smd: 1(-29.53,-37.4) 2(-9.84,-37.4) 3(10,-37.4) 4(30,-37.4) 5(30,38) 6(10,38) 7(-9.84,38) 8(-29.53,38)
  rect 18x18 hole 12: GND(-15.75,0) GND(16,0)
  rect 63x36 smd: GND(0,0)
  silkscreen extent -61,-39 40,40, body extent -39,-40 39,40, height 33
QFN20-RGY [mil] "QFN20-RGY"
  rect 12x34 smd: 1(-29.53,89) 10(-29.53,-88.58) 11(30,-88.58) 20(30,89)
  rect 34x12 smd: 2(-68.9,69) 3(-68.9,50) 4(-68.9,30) 5(-68.9,10) 6(-68.9,-9.84) 7(-68.9,-29.53) 8(-68.9,-49.21) 9(-68.9,-68.9) 12(69,-68.9) 13(69,-49.21) 14(69,-29.53) 15(69,-9.84) 16(69,10) 17(69,30) 18(69,50) 19(69,69)
  silkscreen extent -82,-89 69,102, body extent -72,-92 72,92, height 39
QFN24-RGY [mil] "QFN20-RGY"
  rrect50% 12x34 smd mask+2.76: 1(-29.53,108.68) 12(-29.53,-108.27) 13(30,-108.27) 24(30,108.68)
  rrect50% 34x12 smd mask+2.76: 2(-68.9,88.68) 3(-68.9,69.68) 4(-68.9,49.68) 5(-68.9,29.68) 6(-68.9,9.84) 7(-68.9,-9.84) 8(-68.9,-29.53) 9(-68.9,-49.21) 10(-68.9,-68.9) 11(-68.9,-88.58) 14(69,-88.58) 15(69,-68.9) 16(69,-49.21) 17(69,-29.53) 18(69,-9.84) 19(69,9.84) 20(69,29.69) 21(69,49.68) 22(69,69.68) 23(69,88.69)
  Top region: -40.35,79.72 -15.35,79.72 -15.35,125 -6.3,125 -6.3,96.85 6.3,96.85 6.3,125 15.35,125 15.35,79.72 40.35,79.72 40.35,-79.72 15.35,-79.72 15.35,-125 6.3,-125 6.3,-96.85 -6.3,-96.85 -6.3,-125 -15.35,-125 -15.35,-79.72 -40.35,-79.72
  silkscreen extent -82,-108 69,122, body extent -70,-108 69,110, height 39
QFN-24 [mil] "QFN-24"
  rect 32x12 smd: 1(-78.74,50) 2(-78.74,30) 3(-78.74,10) 4(-78.74,-9.84) 5(-78.74,-29.53) 6(-78.74,-49.21) 13(79,-49.21) 14(79,-29.53) 15(79,-9.84) 16(79,10) 17(79,30) 18(79,50)
  rect 12x32 smd: 7(-49.21,-78.74) 8(-29.53,-78.74) 9(-9.84,-78.74) 10(10,-78.74) 11(30,-78.74) 12(50,-78.74) 19(50,79) 20(30,79) 21(10,79) 22(-9.84,79) 23(-29.53,79) 24(-49.21,79)
  silkscreen extent -79,-79 79,79, body extent -79,-79 79,79, height 35
SJ_3_NO_PLACE_1-2_short [mil] "shorted 1-2 no components, no solder"
  rect 25x50 smd paste-39.37: 1(-35,0) 2(0,0) 3(35,0)
  Top lines w15.75: -34.45,0 0,0
  silkscreen extent -50,-28 50,28
SO08 [mil] "SO08"
  rect 24x87 smd: 1(-75,-103) 2(-25,-103) 3(25,-103) 4(75,-103) 5(75,103) 6(25,103) 7(-25,103) 8(-75,103)
  silkscreen extent -93,-71 93,71, body extent -96,-121 96,121, height 34
SOD323 [mil] "SOD323"
  rect 32x24 smd: A(50,0) C(-49.21,0)
  silkscreen extent -62,-26 50,26, body extent -49,-24 49,25, height 35
SOT23 [mil] "SOT23"
  rect 40x56 smd: 1(-37.4,-43.31) 2(38,-43.31) 3(0,44)
  body extent -57,-50 57,60, height 51
SOT23-3 [mil] "SOT23-3"
  rect 32x36 smd: 1(-37.4,-39.37) 2(38,-39.37) 3(0,44)
  silkscreen extent -55,-4 56,28, body extent -57,-55 57,55, height 51
SOT23-8 [mil] "SOT23-8"
  rect 17x52 smd: 1(-38.39,-46.26) 2(-12.8,-46.26) 3(13,-46.26) 4(39,-46.26) 5(39,47) 6(13,47) 7(-12.8,47) 8(-38.39,47)
  silkscreen extent -59,-39 60,40, body extent -59,-55 59,55, height 44
SOT23-BEC [mil] "SOT23-BEC"
  rect 40x56 smd: B(-37.4,-43.31) C(0,44) E(38,-43.31)
  body extent -57,-55 57,55, height 51
SOT563-6 [mil] "SOT563-6"
  rect 12x18 smd: 1(-19.68,-26.57) 2(0,-26.57) 3(20,-26.57) 4(20,27) 5(0,27) 6(-19.68,27)
  silkscreen extent -31,-24 32,24, body extent -32,-32 31,32, height 23
TQFP48 [mil] "TQFP48"
  rect 10x40 smd: 1(-108.27,-177.17) 2(-88.58,-177.17) 3(-68.9,-177.17) 4(-49.21,-177.17) 5(-29.53,-177.17) 6(-9.84,-177.17) 7(10,-177.17) 8(30,-177.17) 9(50,-177.17) 10(69,-177.17) 11(89,-177.17) 12(109,-177.17) 25(109,178) 26(89,178) 27(69,178) 28(50,178) 29(30,178) 30(10,178) 31(-9.84,178) 32(-29.53,178) 33(-49.21,178) 34(-68.9,178) 35(-88.58,178) 36(-108.27,178)
  rect 40x10 smd: 13(178,-108.27) 14(178,-88.58) 15(178,-68.9) 16(178,-49.21) 17(178,-29.53) 18(178,-9.84) 19(178,10) 20(178,30) 21(178,50) 22(178,69) 23(178,89) 24(178,109) 37(-177.17,109) 38(-177.17,89) 39(-177.17,69) 40(-177.17,50) 41(-177.17,30) 42(-177.17,10) 43(-177.17,-9.84) 44(-177.17,-29.53) 45(-177.17,-49.21) 46(-177.17,-68.9) 47(-177.17,-88.58) 48(-177.17,-108.27)
  silkscreen extent -133,-133 133,133, body extent -178,-178 178,178, height 43
TQFP100 [mil] "TQFP100"
  rect 60x12 smd: 1(-314.96,237) 2(-314.96,217) 3(-314.96,197) 4(-314.96,178) 5(-314.96,158) 6(-314.96,138) 7(-314.96,119) 8(-314.96,99) 9(-314.96,79) 12(-314.96,20) 13(-314.96,0) 14(-314.96,-19.69) 15(-314.96,-39.37) 16(-314.96,-59.06) 17(-314.96,-78.74) 18(-314.96,-98.43) 20(-314.96,-137.8) 21(-314.96,-157.48) 22(-314.96,-177.17) 23(-314.96,-196.85) 24(-314.96,-216.54) 25(-314.96,-236.22) 51(315,-236.22) 52(315,-216.54) 53(315,-196.85) 54(315,-177.17) 55(315,-157.48) 56(315,-137.8) 57(315,-118.11) 58(315,-98.43) 59(315,-78.74) 60(315,-59.06) 61(315,-39.37) 62(315,-19.69) 63(315,0) 64(315,20) 65(315,40) 66(315,60) 67(315,79) 68(315,99) 69(315,119) 70(315,138) 71(315,158) 72(315,178) 73(315,197) VDD(-314.96,-118.11) VDD(-314.96,40) VDD(315,237) VSS(-314.96,60) VSS(315,217)
  rect 12x60 smd: 26(-236.22,-314.96) 29(-177.17,-314.96) 30(-157.48,-314.96) 31(-137.8,-314.96) 32(-118.11,-314.96) 33(-98.43,-314.96) 34(-78.74,-314.96) 35(-59.06,-314.96) 36(-39.37,-314.96) 37(-19.69,-314.96) 38(0,-314.96) 39(20,-314.96) 40(40,-314.96) 41(60,-314.96) 42(79,-314.96) 44(119,-314.96) 45(138,-314.96) 46(158,-314.96) 47(178,-314.96) 48(197,-314.96) 49(217,-314.96) 76(237,315) 77(217,315) 78(197,315) 79(178,315) 80(158,315) 81(138,315) 82(119,315) 83(99,315) 84(79,315) 85(60,315) 86(40,315) 87(20,315) 88(0,315) 89(-19.69,315) 90(-39.37,315) 91(-59.06,315) 92(-78.74,315) 93(-98.43,315) 94(-118.11,315) 95(-137.8,315) 96(-157.48,315) 97(-177.17,315) 98(-196.85,315) VDD(-236.22,315) VDD(-196.85,-314.96) VDD(237,-314.96) VSS(-216.54,315) VSS(-216.54,-314.96)
  rect 12x59.06 smd: 43(99.01,-314.96)
  silkscreen extent -276,-276 276,276, body extent -315,-315 315,315, height 47
TSSOP8_SOT505-2 [mil] "TSSOP8_SOT505-2"
  rect 14x34 smd: 1(-38.39,-69.88) 2(-12.8,-69.88) 3(13,-69.88) 4(39,-69.88) 5(39,70) 6(13,70) 7(-12.8,70) 8(-38.39,70)
  silkscreen extent -73,-85 58,40, body extent -61,-81 61,81, height 43

## Part data
"3DR Logo": library part 3DR_LOGO
C1001 C3001 C3002 C3003 C3004 C4003 C4005 C4006 C5001 C5005 C5007 C5009 C5010 C5011 C5012 C5014 C5015 C7001 C7002 C7003 C7006 C8001 C8002 C8003 C10002: library part CAP0402, "CAP CER 0.1UF 16V Y5V 0402"
C1002 C1003 C7004 C7005: library part CAP0402, "CAP CER 8PF 50V C0G 0402"
C4001 C4002 C5013 C5016: library part CAP0603, "CAP CER 2.2UF 16V 10% X6S 0603"
C4004: library part CAP0603, "CAP CER 10000PF 25V 5% X7R 0603"
C4007: library part CAP0402, "CAP CER 0.22UF 25V 10% X7R 0402"
C4008: library part CAP0805, "CAP CER 4.7UF 16V 10% X7R 0805"
C5002 C10001: library part CAP0805, "CAP CER 10UF 25V 10% X5R 0805"
C5003 C10003: library part CAP0402, "CAP CER 10000PF 16V 10% X7R 0402"
C5004 C10005: library part CAP0603, "CAP CER 1UF 16V Y5V 0603"
C5006 C5008: library part CAP0805, "CAP CER 22UF 25V 20% X5R 0805"
C5100 C5101: library part Capacitor
C10004: library part CAP0603, "CAP CER 10UF 10V 10% X5R 0603"
D5001: library part DIODE-SCHOTTKY_SOD323, "DIODE SCHOTTKY 30V 0.03A SOD323"
D8001 D8002: "TVS DIODE 14VWM 40VC 0402"
D10001: "DIODE SCHOTTKY 20V 500MA TO236AB"
F10001: library part PTCSMD, "PTC RESTTBLE 0.35A 16V CHIP 1206"
J2001: library part MOLEX-47346-0001, "MICRO USB B, BOTTOM MOUNT"
JP1: library part JUMPER-31-2
L2001 L2002 L5001: library part KNH16C104DA5TS, "FILTER CAP 0.1UF 2A 25V 0603"
LED1 LED2 LED6001 LED6002 LED6003 LED6004 LED6005 LED6006 LED6007 LED6008 LED6009: library part LED0603_Blue, "LED GREEN ROUND CLEAR SMD"
LED6010 LED6011: library part LED0603, "LED 1.6X0.8 DOME ORN CLEAR SMD"
PCB005: library part PCB_0005, "PCB,FMU, PX2, Board"
Q5001: "TRANSISTOR SWITCHING PNP SOT-23"
Q6001: "MOSFET N-CH 100V 170MA SOT23-3"
R1 R2 R1020 R1022 R4001 R4002 R6003 R6004 R6005 R6006 R6007 R6008 R6009 R6010 R6011 R6012 R6013 R6014 R6015 R7003 R7004 R7010 R7011 R7012 R7013: library part RESISTOR0402-RES, "RES 220 OHM 1/16W 1% 0402 SMD"
R1001: library part RESISTOR0402-RES, "RES 470 OHM 1/16W 1% 0402 SMD"
R1002 R1021 R5001 R5006 R6002 R7001 R7002 R8001: library part RESISTOR0402-RES, "RES 10K OHM 1/16W 1% 0402 SMD"
R2001 R2002: library part RESISTOR0402-RES, "RES 10K OHM 1/16W .1% 0402 SMD"
R2003 R2004: library part RESISTOR0402-RES, "RES 1M OHM 1/16W 1% 0402 SMD"
R3001 R3002 R3003 R3004 R6017: library part RESISTOR0402-RES, "RES 1.5K OHM 1/16W 1% 0402 SMD"
R3005 R3006 R3007 R3008 R3009 R3010: library part RESISTOR0402-RES, "RES 120 OHM 1/16W 1% 0402 SMD"
R5002: library part RESISTOR0402-RES, "RES 1.8K OHM 1/16W 1% 0402"
R5003: library part RESISTOR0603-RES, "RES 10 OHM 1/10W 5% 0603"
R5005 R6001: library part RESISTOR0402-RES, "RES 1K OHM 1/16W 1% 0402"
R6016: library part RESISTOR0402-RES, "Thick Film Resistors - SMD 0402 68ohms 5% Tol"
R10001: library part RESISTOR0402-RES, "RES 100K OHM 1/16W 1% 0402 SMD"
RN2001: library part 8R-NEXB2HV-100K, "RES ARRAY 100K OHM 8 RES 1506"
RN2002: library part 8R-NEXB2HV-10K, "RES ARRAY 10K OHM 8 RES 1506"
RN3001 RN3002: library part 8R-NEXB2HV-120R, "RES ARRAY 120 OHM 8 RES 1506"
RN8001 RN8002: library part 8R-NEXB2HV-220R, "RES ARRAY 120 OHM 8 RES 1506"
U405: library part MPU-6500
U1001: library part STM32F4X7VX, "REV 3 Silicon or later IC MCU ARM 2MB FLASH 100LQFP"
U1002: "IC FRAM 128KBIT 40MHZ 8SOIC"
U2001: "IC FILTER USB ESD PROTECT SOT363"
U2002: library part MICROSDSDI, "CONN MICRO SD CARD PUSH-PUSH R/A"
U3001 U3002 U8001: "IC XLATR VOLT-LVL 8B BDIR 20QFN"
U3003 U3004: library part MAX3051MAX3051EKA, "IC TXRX CAN 1MBPS SOT23-8"
U4001: "GYRO/ACCELEROMETER 6AXIS 24QFN"
U4002: "IC COMPASS 3 AXIS 16-LCC"
U4003: "Board Mount Pressure Sensors"
U5001 U10002: "IC REG LDO 3.3V 0.3A 8TMLF"
U7001: library part STM32F10XCXT6, "MCU 32BIT ARM 64K FLASH 48LQFP"
U8003: library part 74LVC2G240-TSSOP-8, "IC INVERTER DUAL 4-INPUT 8TSSOP"
U10001: "IC LI+ CHARGER FRONT END 8-SON"
U$2: "CONN RCPT 20POS 0.4MM SMD GOLD"
U$9001: "CONN RECEPT 80POS .5MM SMD W/FIT"
X1001 X7001: library part OSCILLATOR-3.2X2.5, "CRYSTAL 24MHZ 8PF SMD"

## Via types
v1: diameter 0.453/0.453/0.453/0.453/0.453/0.453/0.453/0.453 (per signal layer), hole 0.203, Top to Bottom, tented both sides, 178 vias
v2: diameter 0.453/0.453/0.453/0.453 (per signal layer), hole 0.203, Top to Verticall_top, tented both sides, 117 vias
v3: diameter 0.453/0.453/0.453/0.453 (per signal layer), hole 0.203, Horizontal_bot to Bottom, tented both sides, 94 vias
v4: diameter 0.4, hole 0.2, Horizontal_bot to Bottom, tented both sides, 8 vias
v5: diameter 0.4, hole 0.2, Top to Verticall_top, tented both sides, 7 vias
v6: diameter 0.45, hole 0.2, Horizontal_bot to Bottom, tented bottom, 4 vias
v7: diameter 0.5, hole 0.2, Top to Verticall_top, tented both sides, 4 vias
v8: diameter 0.4, hole 0.2, Top to Bottom, tented bottom, 2 vias
v9: diameter 0.453/0.453/0.453/0.453/0.453/0.453/0.453/0.453 (per signal layer), hole 0.203, Top to Bottom, tented top, 2 vias
v10: diameter 0.5, hole 0.2, Horizontal_bot to Bottom, tented both sides, 2 vias
v11: diameter 0.453/0.453/0.453/0.453 (per signal layer), hole 0.203, Horizontal_bot to Bottom, tented bottom, 1 vias
v12: diameter 0.45, hole 0.2, Top to Verticall_top, tented top, 1 vias
v13: diameter 0/0/0/0/0/0 (per signal layer), hole 0.66, HorizontalTop to Bottom, tented bottom, 1 vias
v14: diameter 0.5, hole 0.2, Top to Bottom, tented both sides, 1 vias
v15: diameter 0.4, hole 0.2, Top to Bottom, tented both sides, 1 vias
v16: diameter 0.453/0.453/0.453/0.453/0.453/0.453/0.453/0.453 (per signal layer), hole 0.203, Top to Bottom, tented bottom, 1 vias
v17: diameter 0.453/0.453/0.453/0.453 (per signal layer), hole 0.203, Top to Verticall_top, tented top, 1 vias
v18: diameter 0.5, hole 0.2, HorizontalTop to Bottom, tented both sides, 1 vias
v19: diameter 0.4, hole 0.2, Top to Verticall_top, tented top, 1 vias

## Nets (pads, with @x,y where several pads share a name; then routed paths per layer and width w, separated by ;. In a path a pad name is that pad's centre, name@x,y a point inside that pad or via, vN(x,y) a via of type N, cw(c..) or ccw(c..) an arc to the next point about the centre after c; other vN are vias at no path point)
A\C\C\E\L\_\M\A\G\_\E\X\T\_\C\S\: U1001.9 U$2.2 | length 12.5
  Top w0.15: v2(37.998,40.005) 38.354,40.005 U1001.9@39.04,40.691 ; v2(38.887,30.48) 39.192,30.785 39.192,31.42 39.167,31.471 U$2.2@39.167,31.598
  Verticall_top w0.15: v2(37.998,40.005) 38.887,39.116 v2(38.887,30.48)
ALARM: U1001.77 U$9001.24 | length 18.4
  Top w0.15: U1001.77@44.348,54.483 44.374,54.483 45.11,53.721 45.364,53.721 v1(46.253,52.832)
  VerticalBot w0.15: v1(46.253,52.832) 46.253,48.768 45.11,47.625 45.11,42.545 45.547,42.109 45.547,41.9 45.89,41.557 45.977,41.557 46.071,41.463 46.071,41.411 46.126,41.355 46.126,40.894 46.253,40.767 47.396,40.767 v3(47.396,41.148)
  Bottom w0.15: U$9001.24@46.965,40.107 46.965,40.716 v3(47.396,41.148)
AUX_BATT_CURRENT_SENS: RN2002.9 U$9001.25 | length 20.6
  Top w0.15: RN2002.9@47.041,31.979 47.015,31.953 47.015,31.928 47.32,31.928 47.828,31.42 48.031,31.42 47.854,31.242 v1(47.676,31.242)
  VerticalBot w0.15: v1(47.676,31.242) 48.285,31.242 49.124,32.08 50.013,32.08 50.444,32.512 50.444,33.655 49.858,34.242 49.858,36.02 49.555,36.322 49.555,42.672 49.174,43.053 v3(49.047,43.053)
  Bottom w0.15: U$9001.25@46.457,45.288 46.457,43.925 46.857,43.51 47.213,43.51 47.463,43.261 47.838,43.261 47.91,43.332 48.26,43.332 48.539,43.053 v3(49.047,43.053)
AUX_BATT_VOLTAGE_SENS: RN2002.10 U$9001.23 | length 16.7
  Top w0.15: RN2002.10@46.558,31.979 46.507,31.953 46.507,31.496 46.761,31.242 46.812,31.242 46.761,31.191 v1(46.761,31.166)
  VerticalBot w0.15: v1(46.761,31.166) 46.761,33.172 46.888,33.299 46.685,33.503 46.685,35.782 46.888,35.985 46.888,37.592 47.172,37.876 47.178,37.876 47.904,38.603 47.904,43.12 47.638,43.386 47.515,43.386 47.323,43.578 47.323,43.701 v3(46.92,44.104)
  Bottom w0.15: v3(46.92,44.104) 46.92,43.936 46.965,43.891 U$9001.23@46.965,45.288